# Altium PCB iMX6 Rex_V1I1_PCB.PcbDoc (part 1 of 8)
Units mm, origin at the board's own origin, x right, y up, seen from the top; angles counter-clockwise.
Board outline 70 x 40 mm, 12 copper layers (L1, L2, L3, L4, L5 (PWR), L6 (PWR), L7 (PWR), L8 (PWR), L9, L10, L11, L12), stack 1.566 mm thick; 473 components, 409 nets, 2294 pads, 1880 vias.
Unrouted connection lines stored in the file: 7.
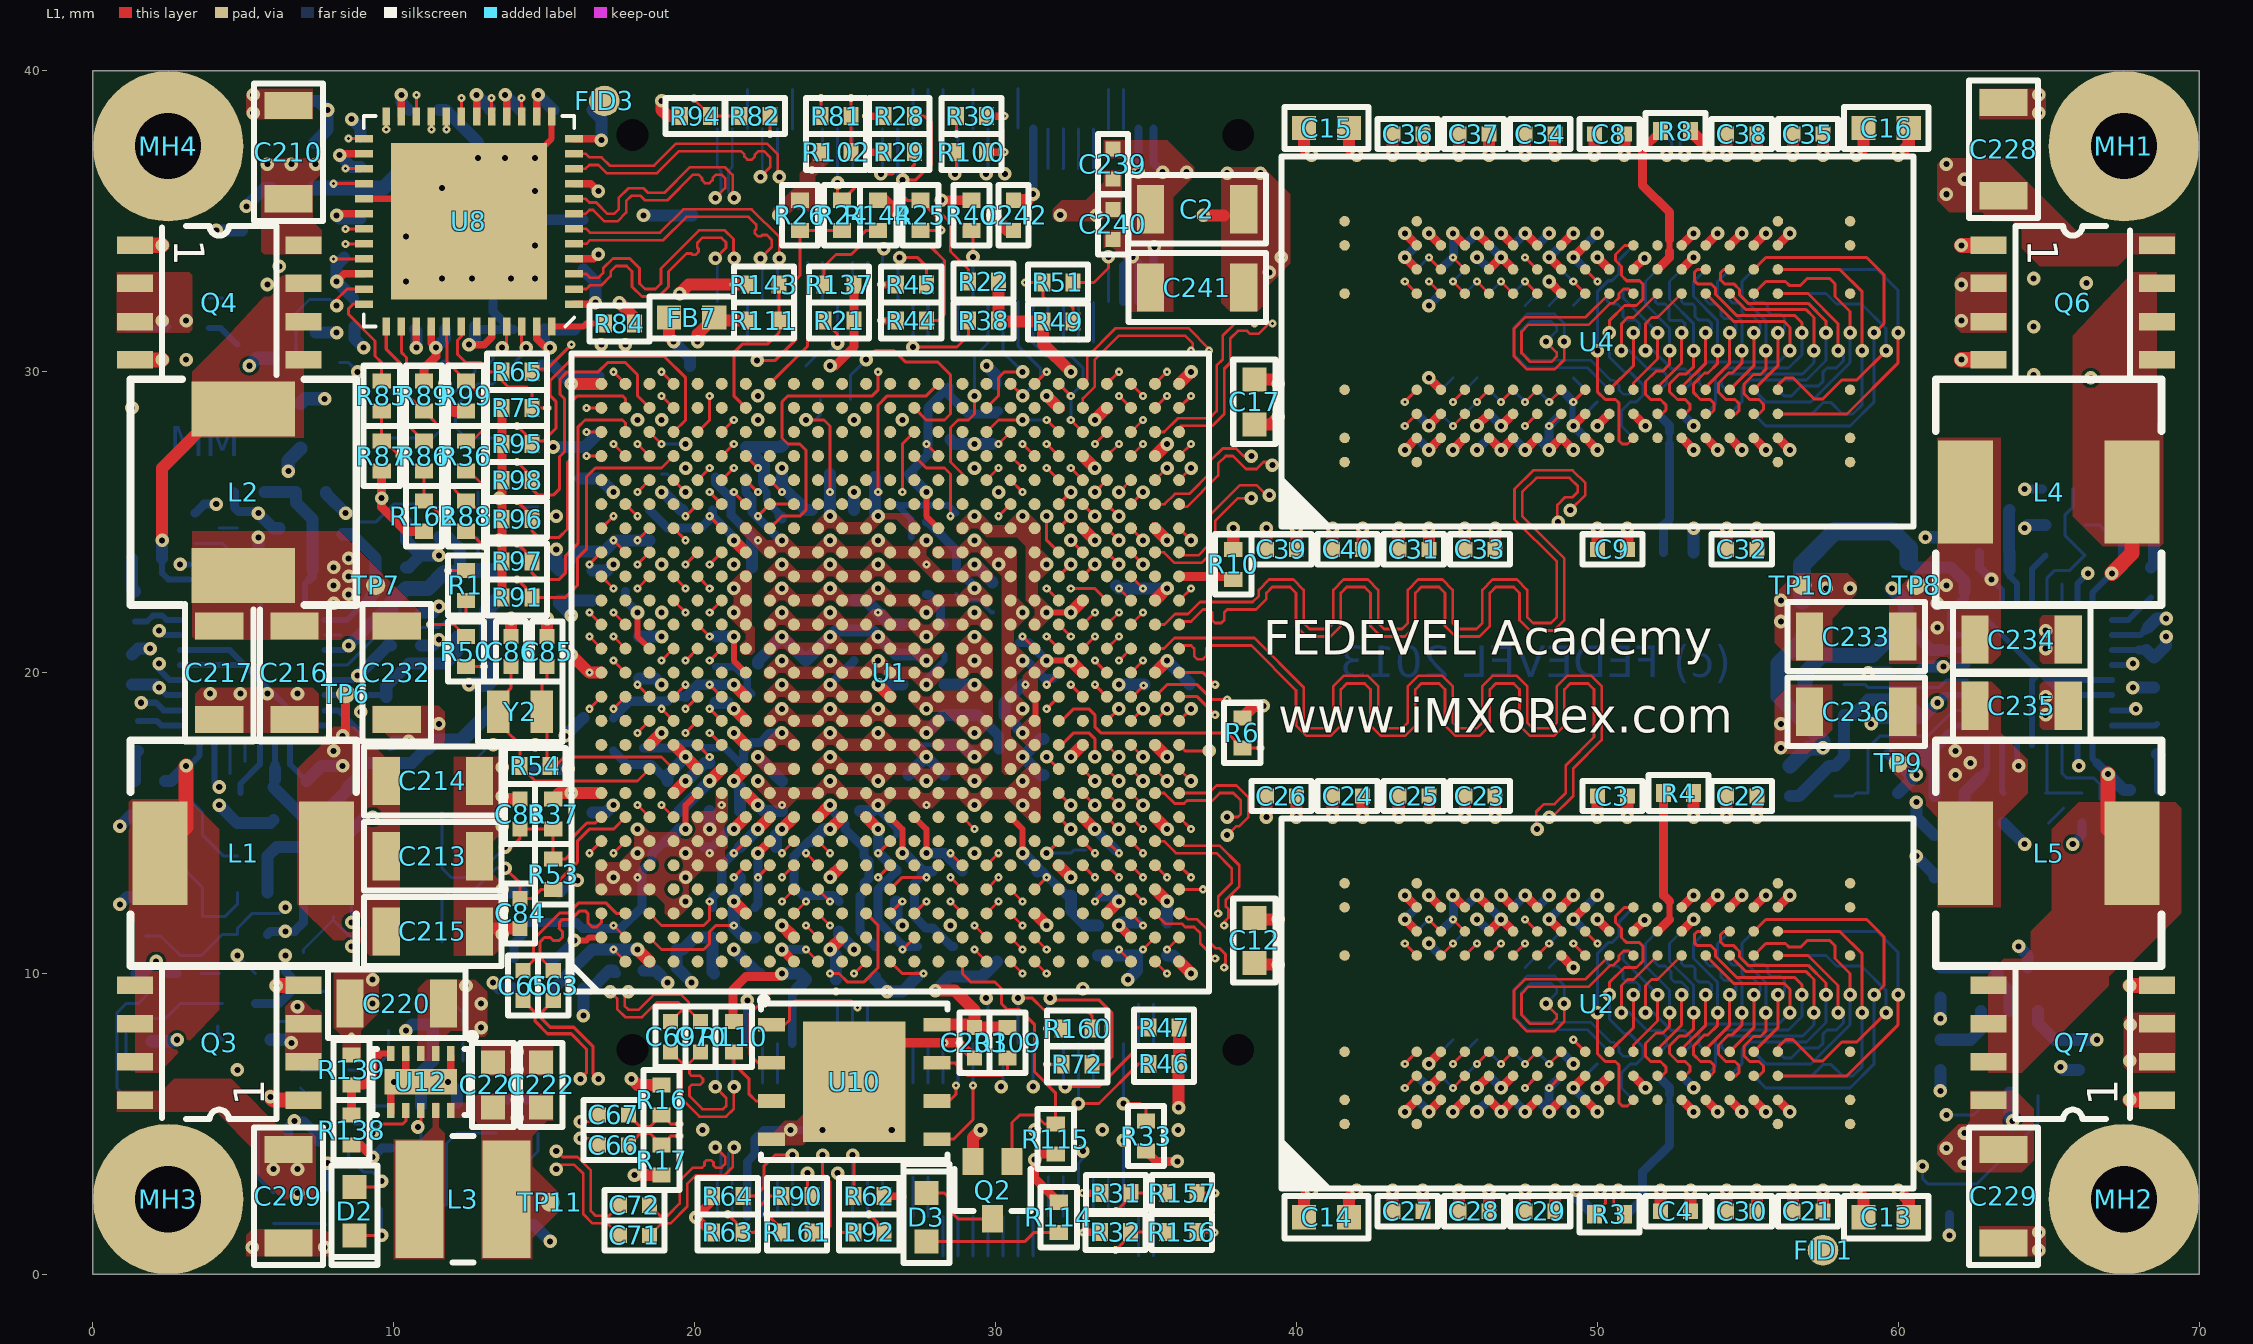
[diagram p0: L1 view]
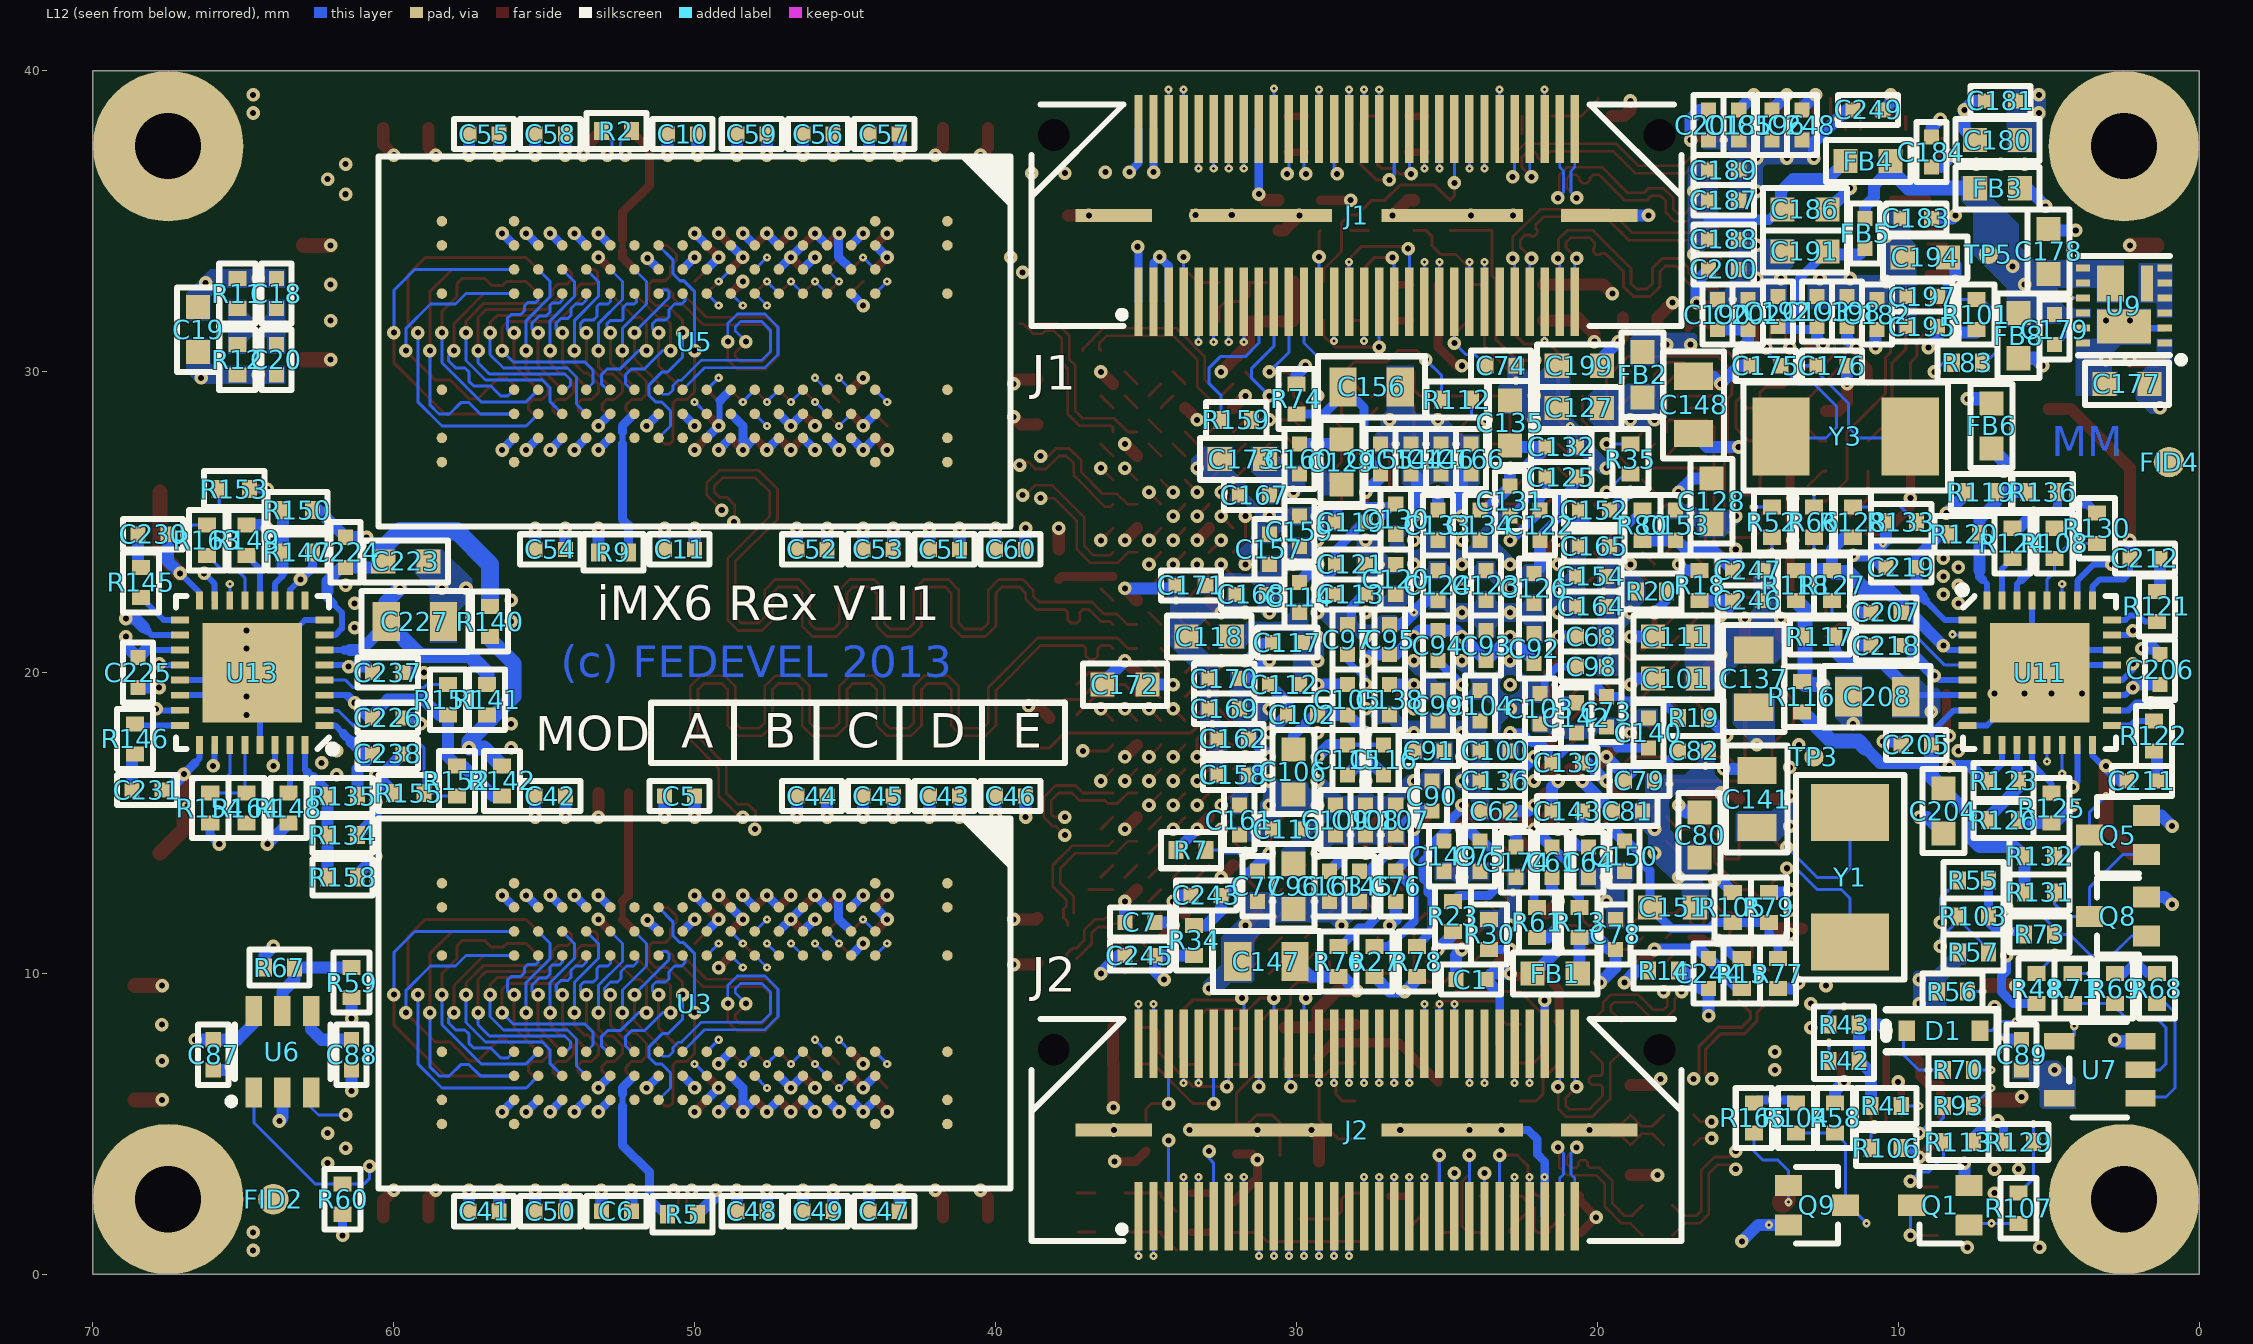
[diagram p1: L12 view, seen from below]
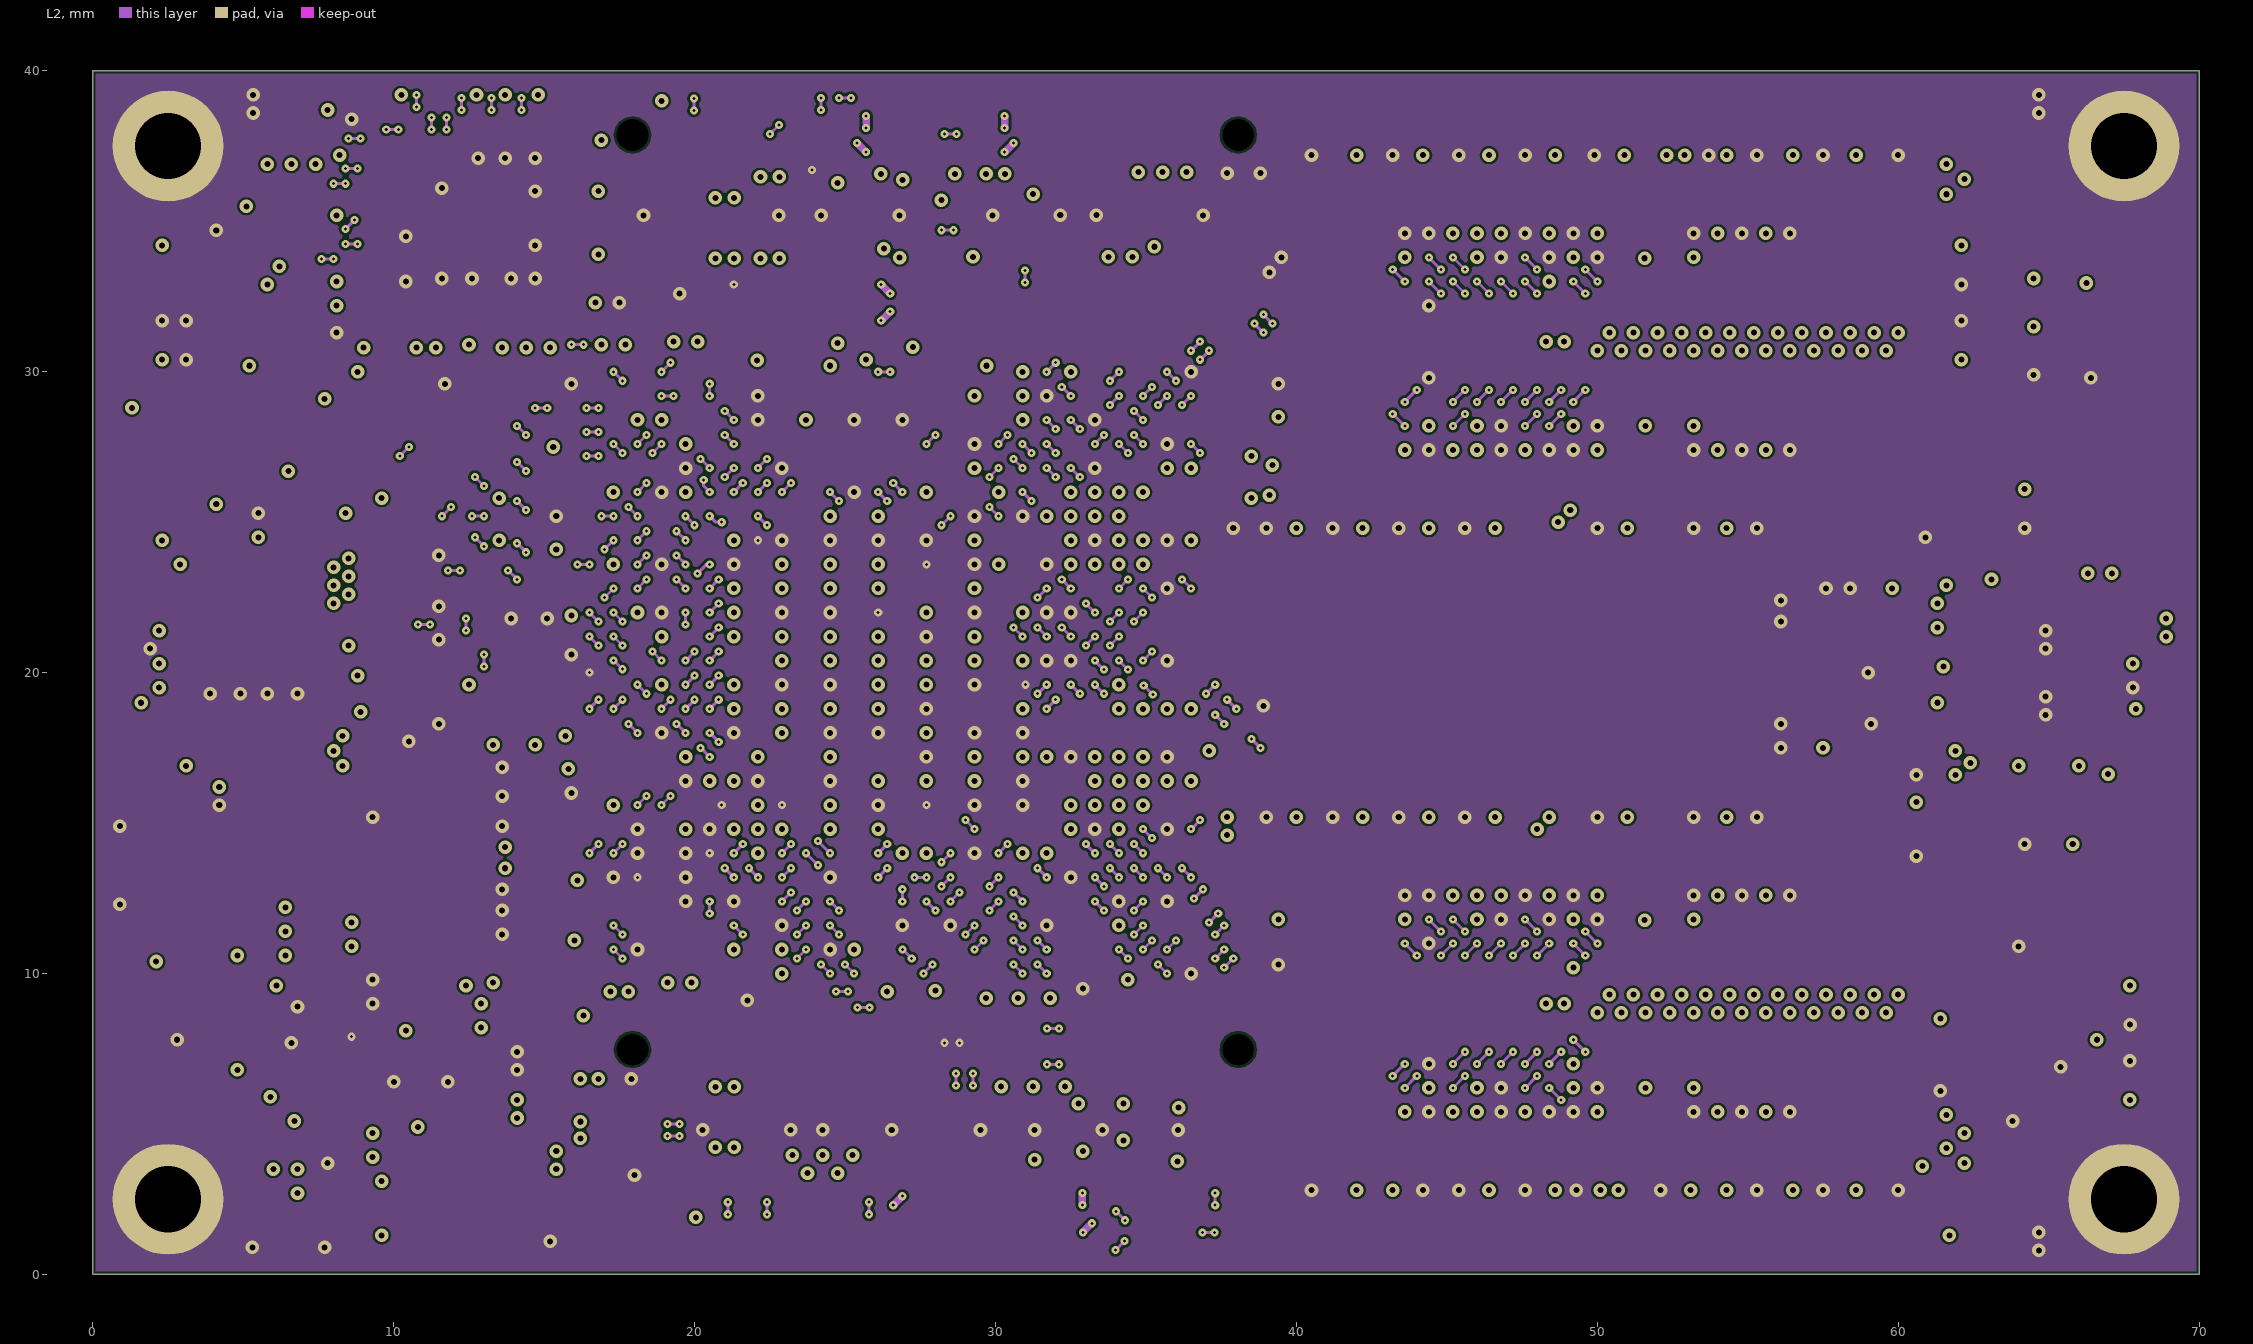
[diagram p2: L2]
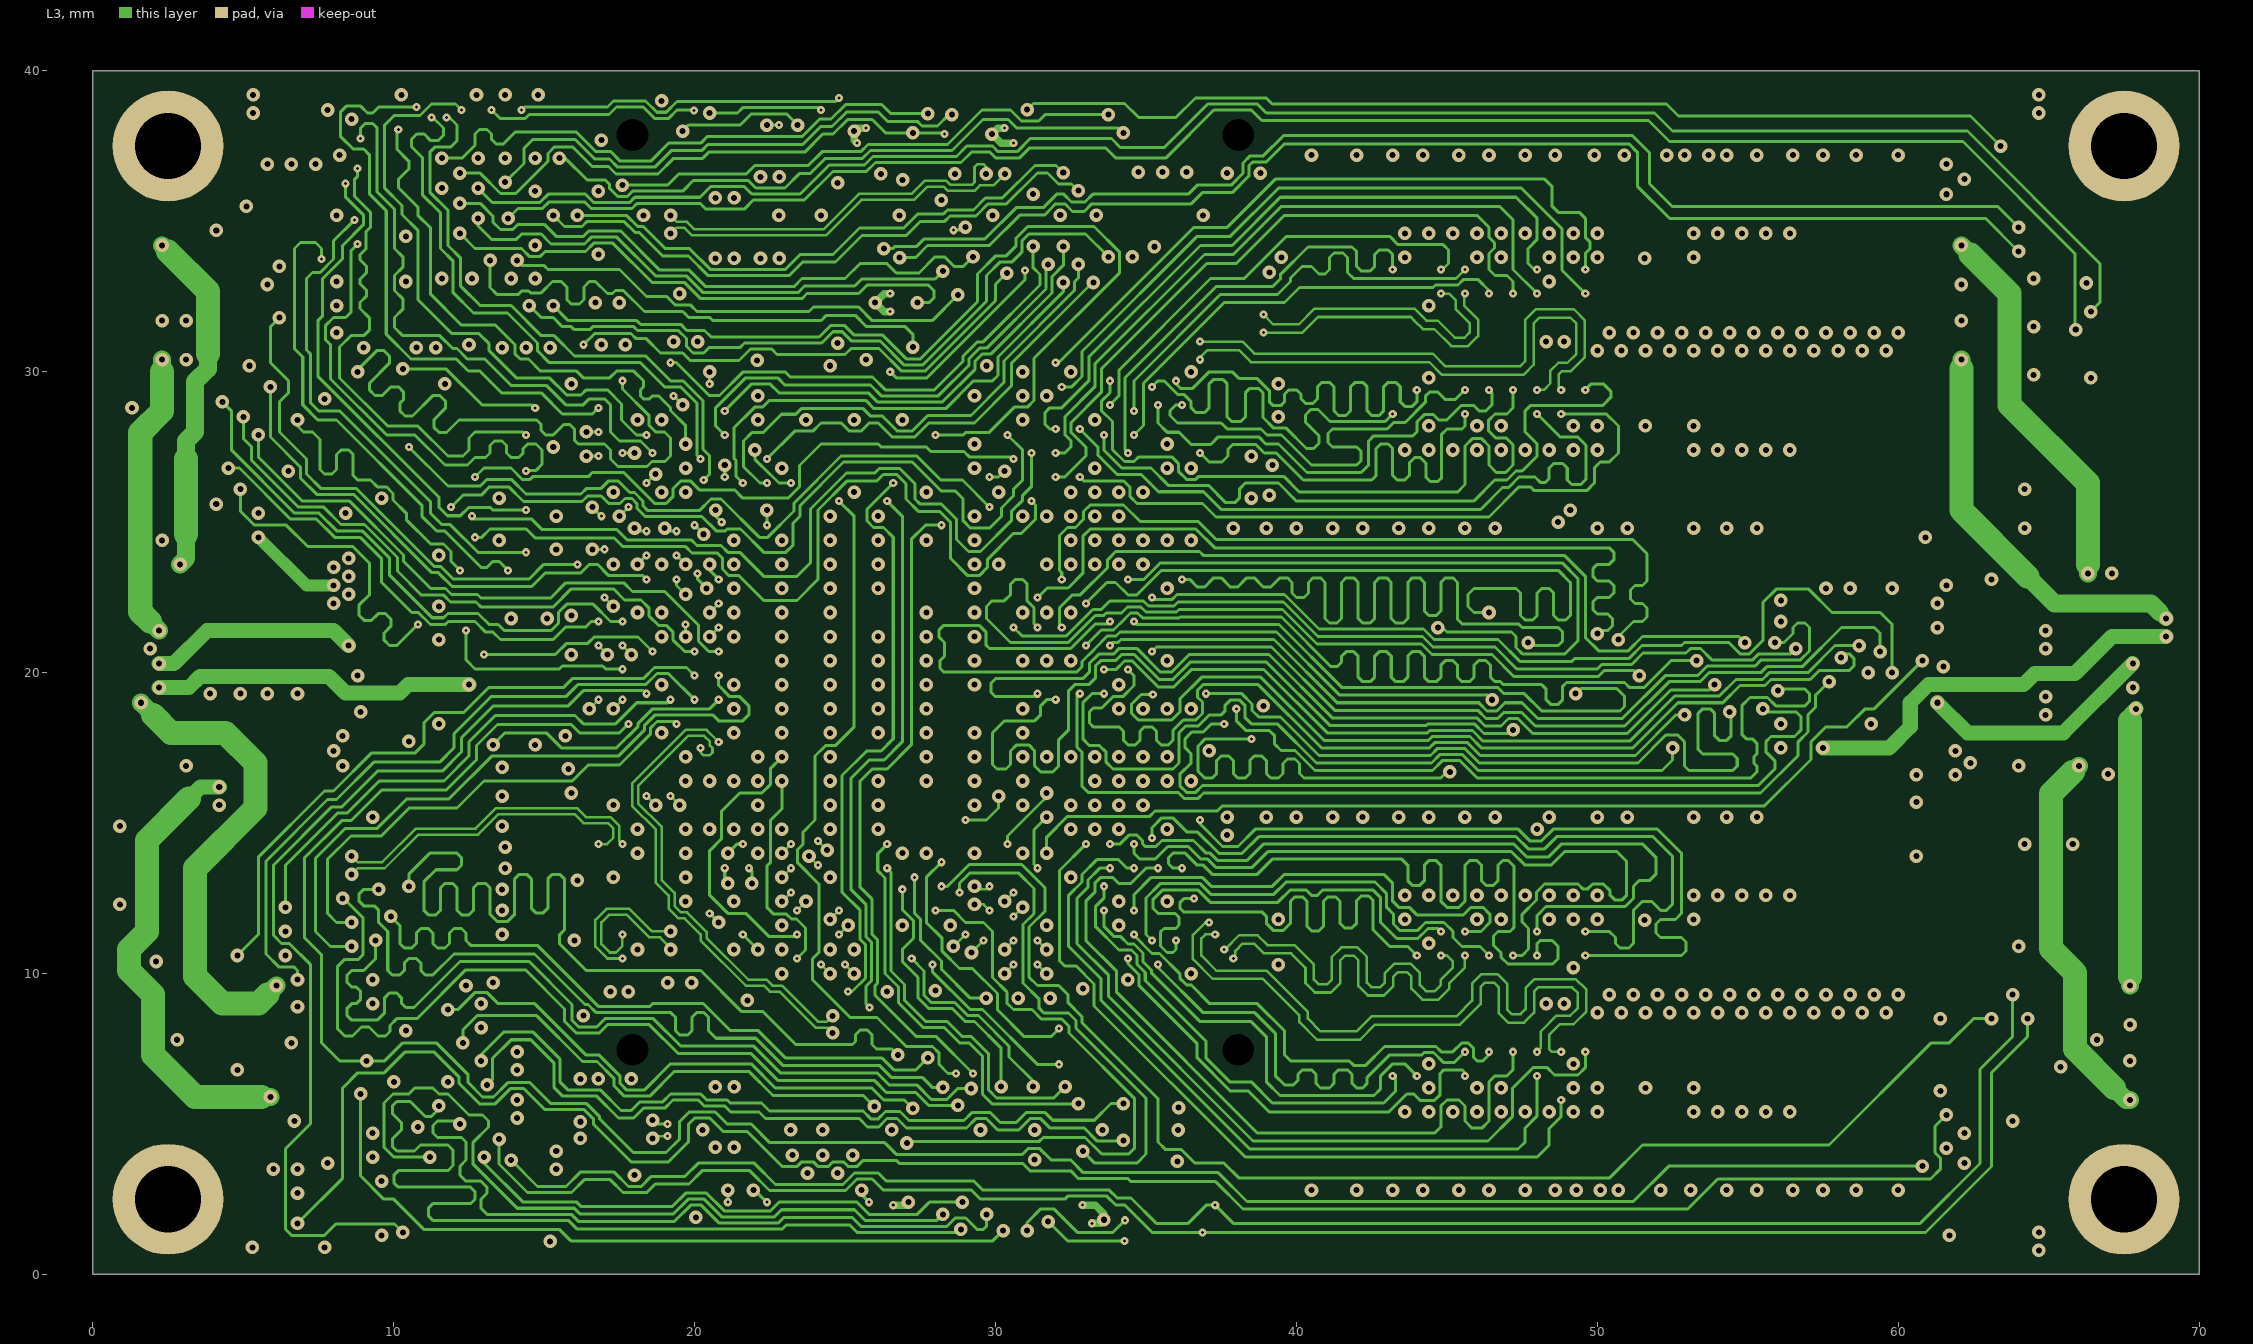
[diagram p3: L3]
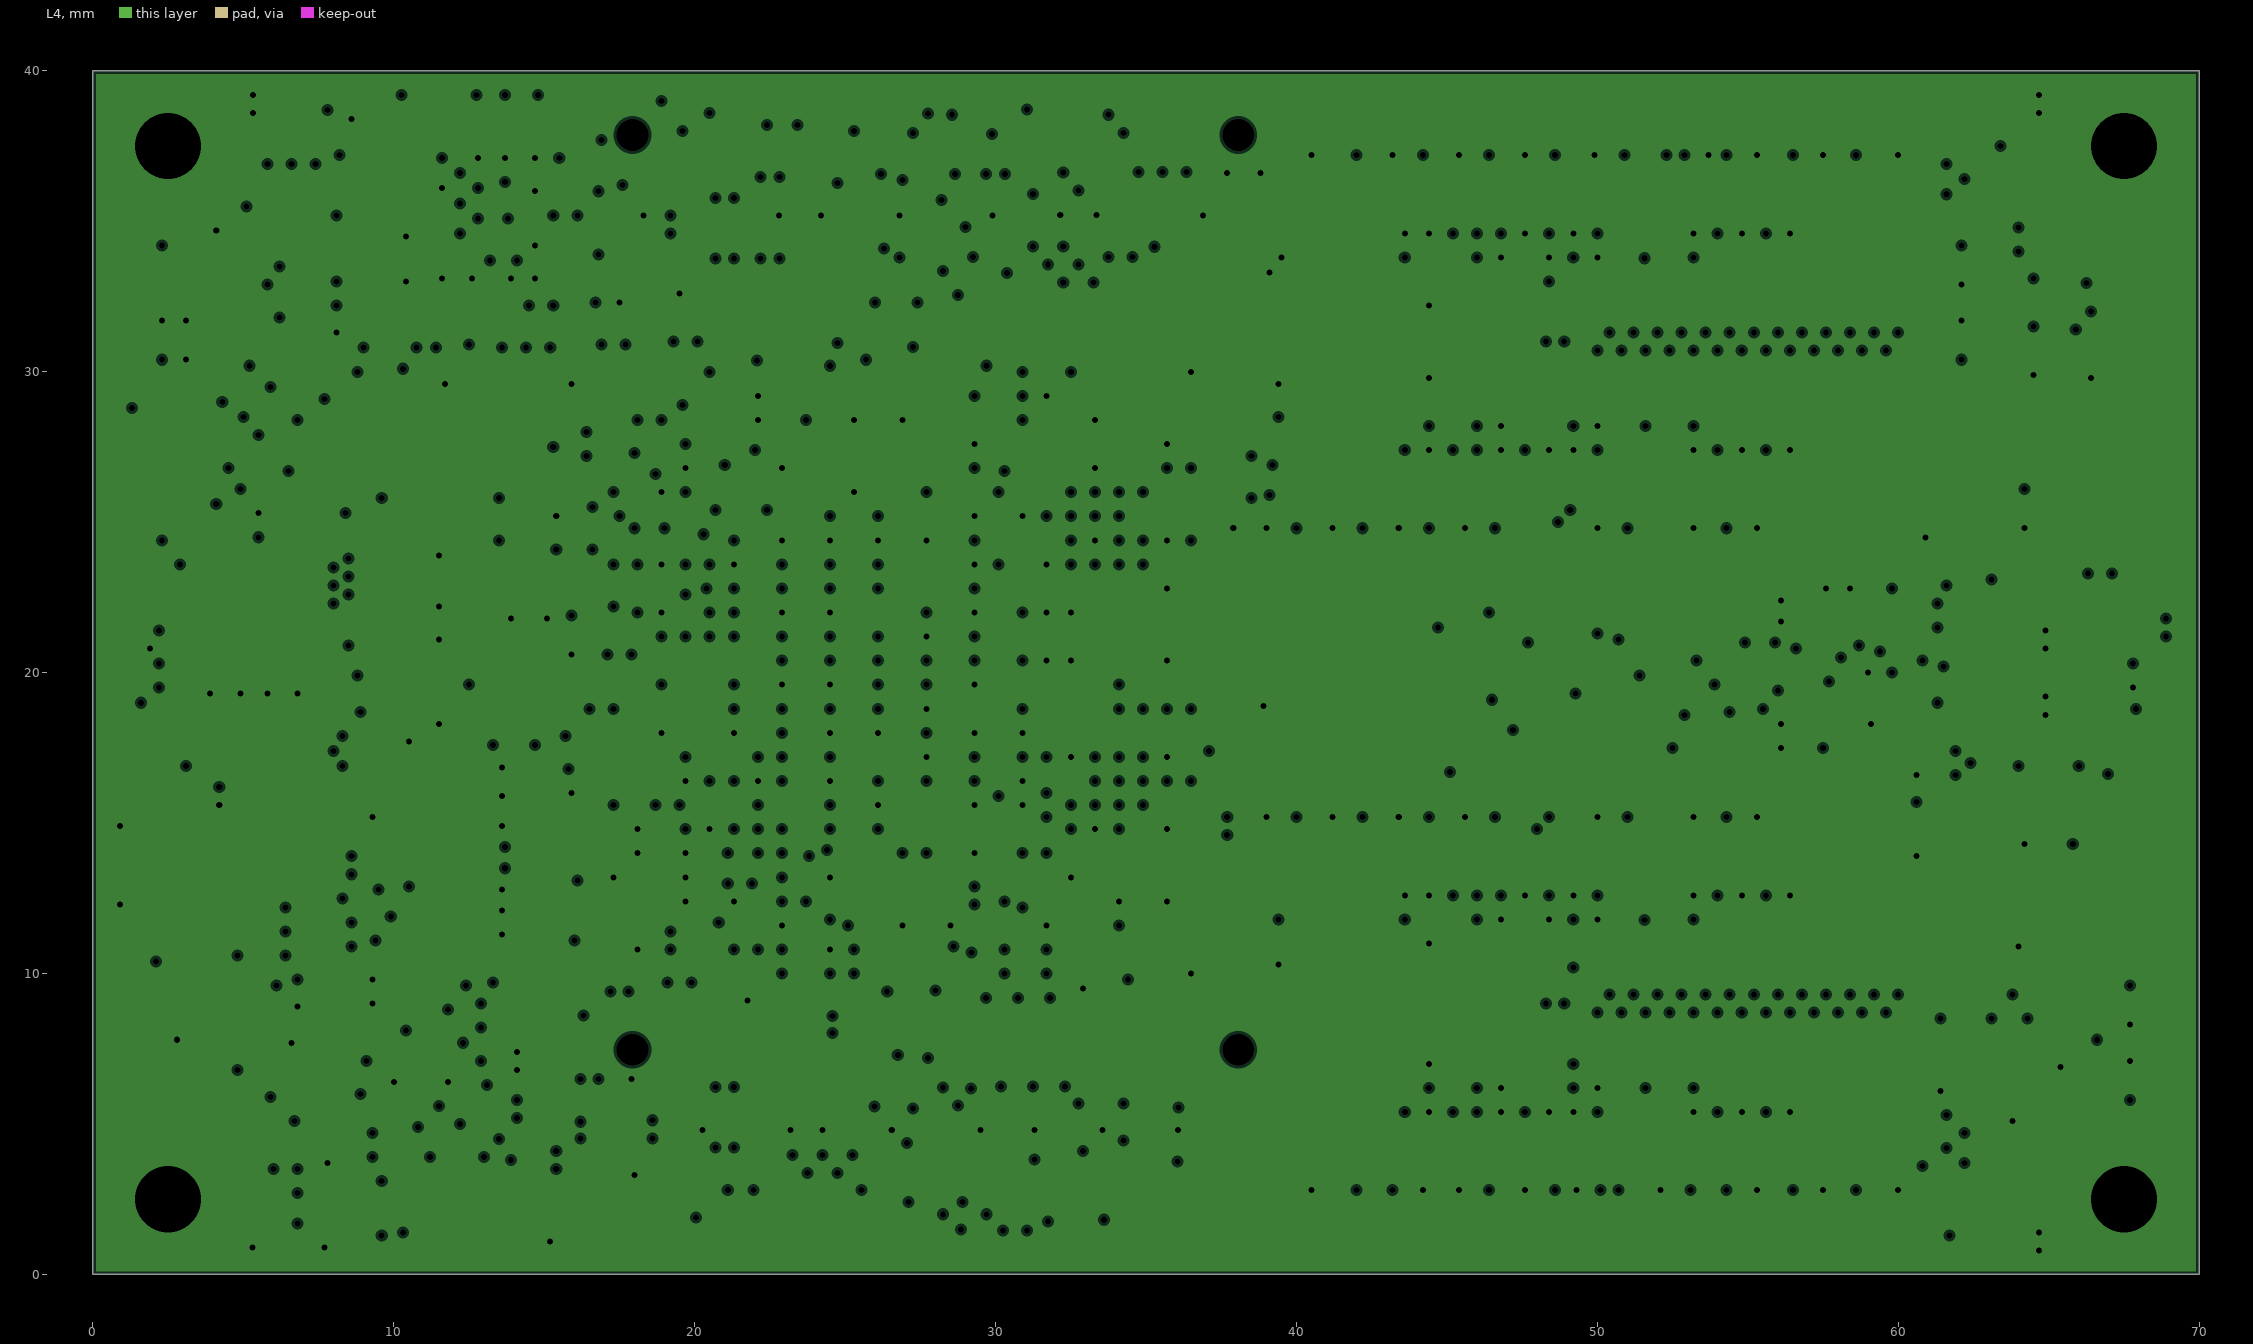
[diagram p4: L4, clearances drawn from the general rule]
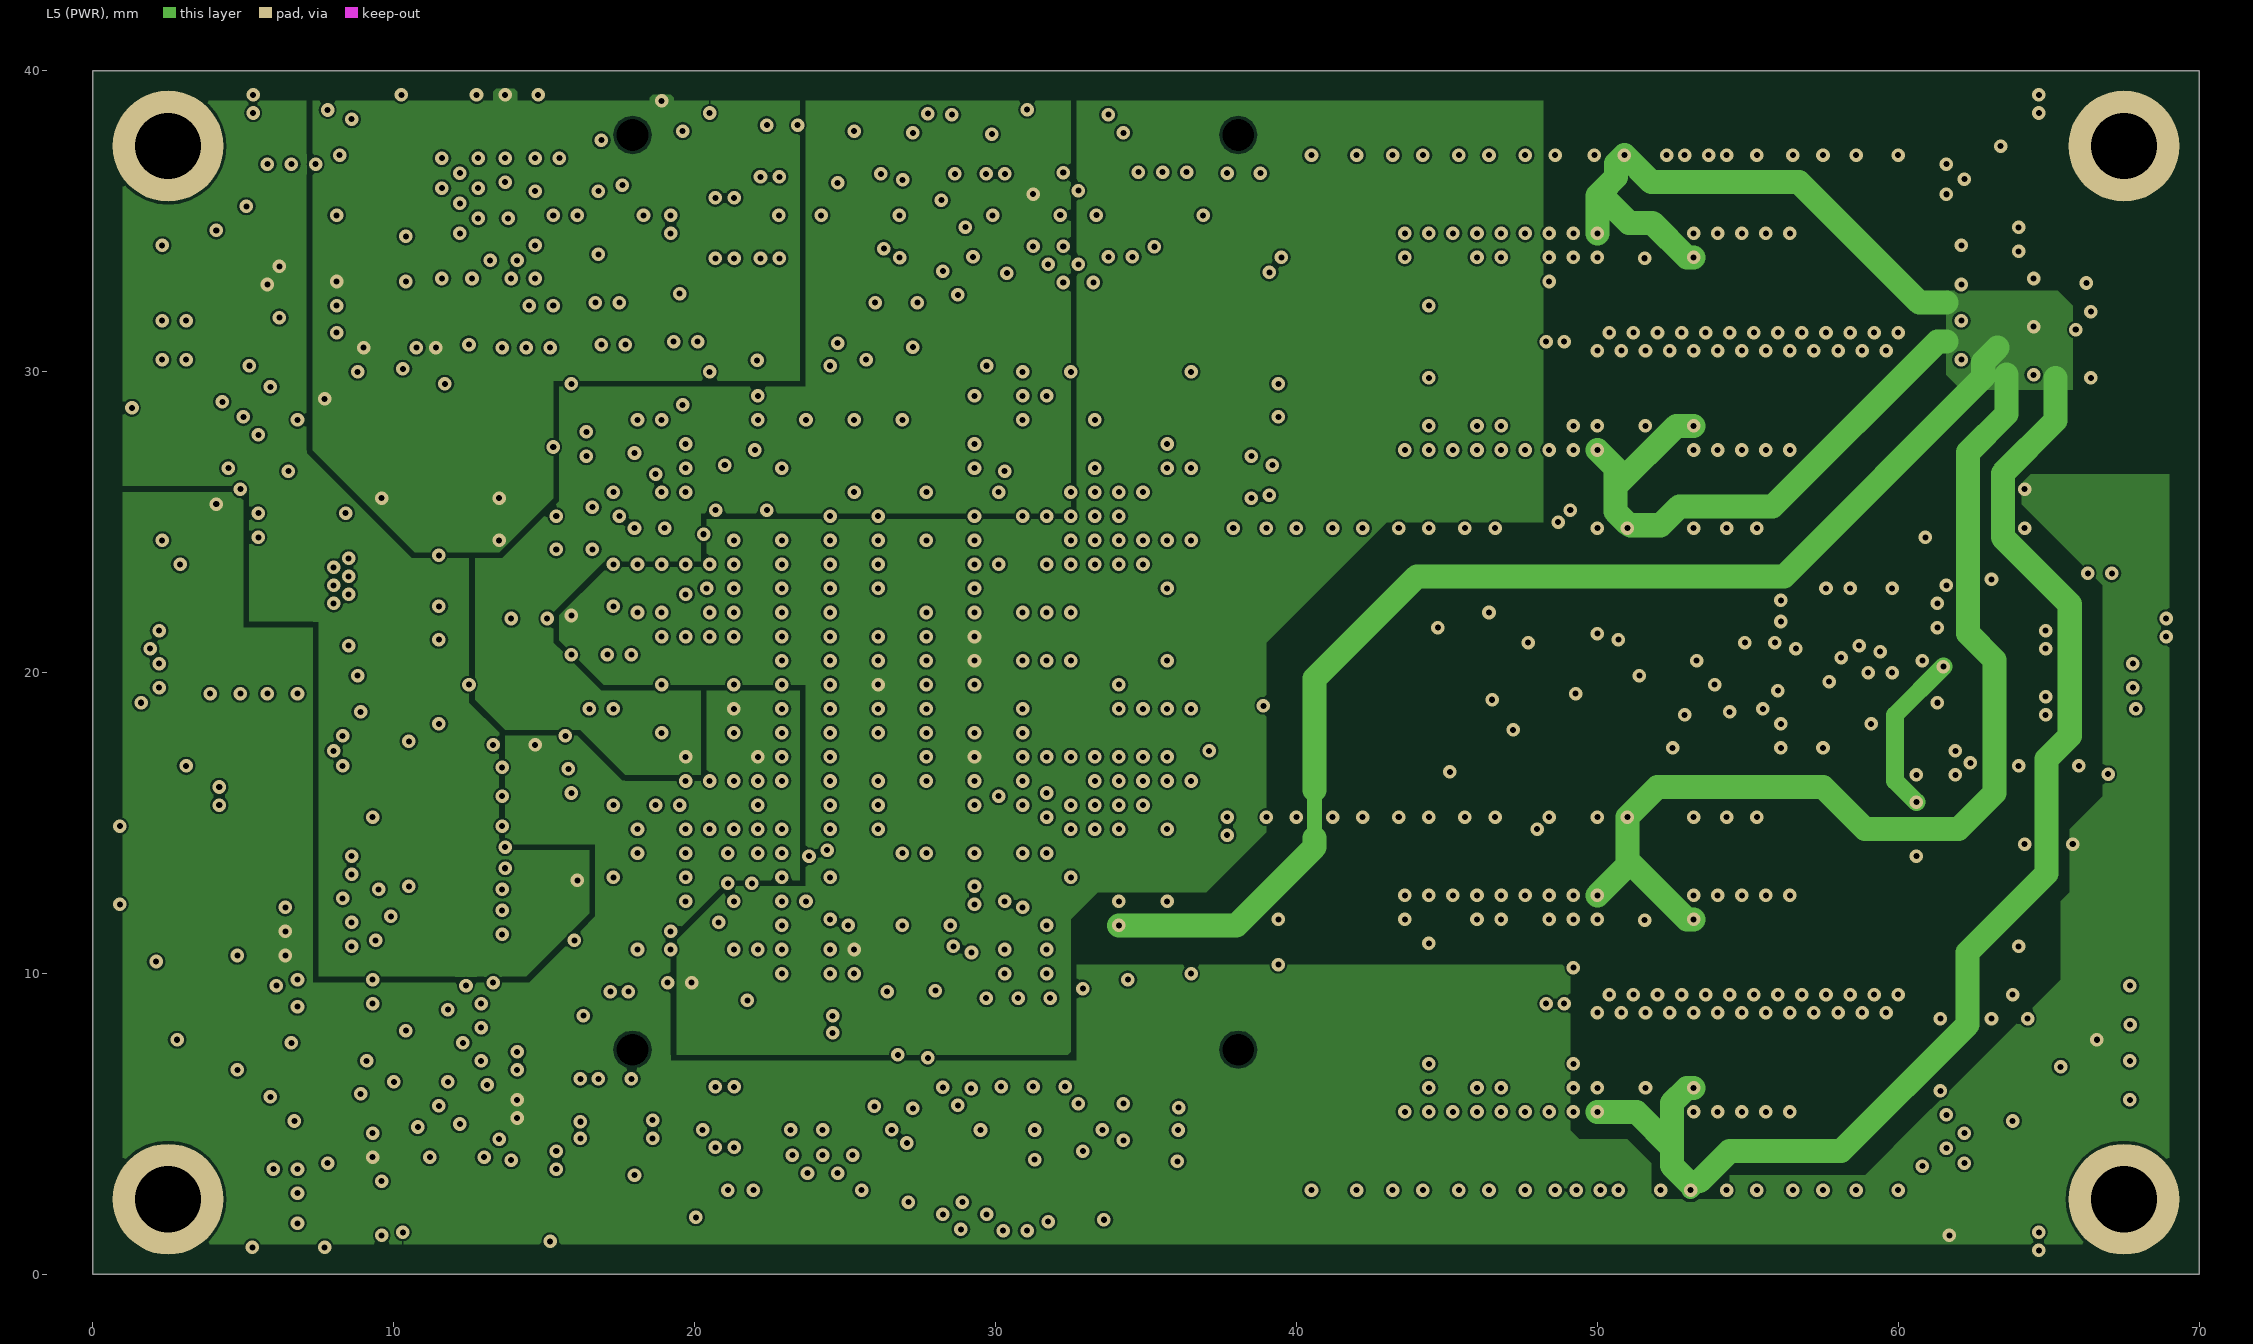
[diagram p5: L5 (PWR)]
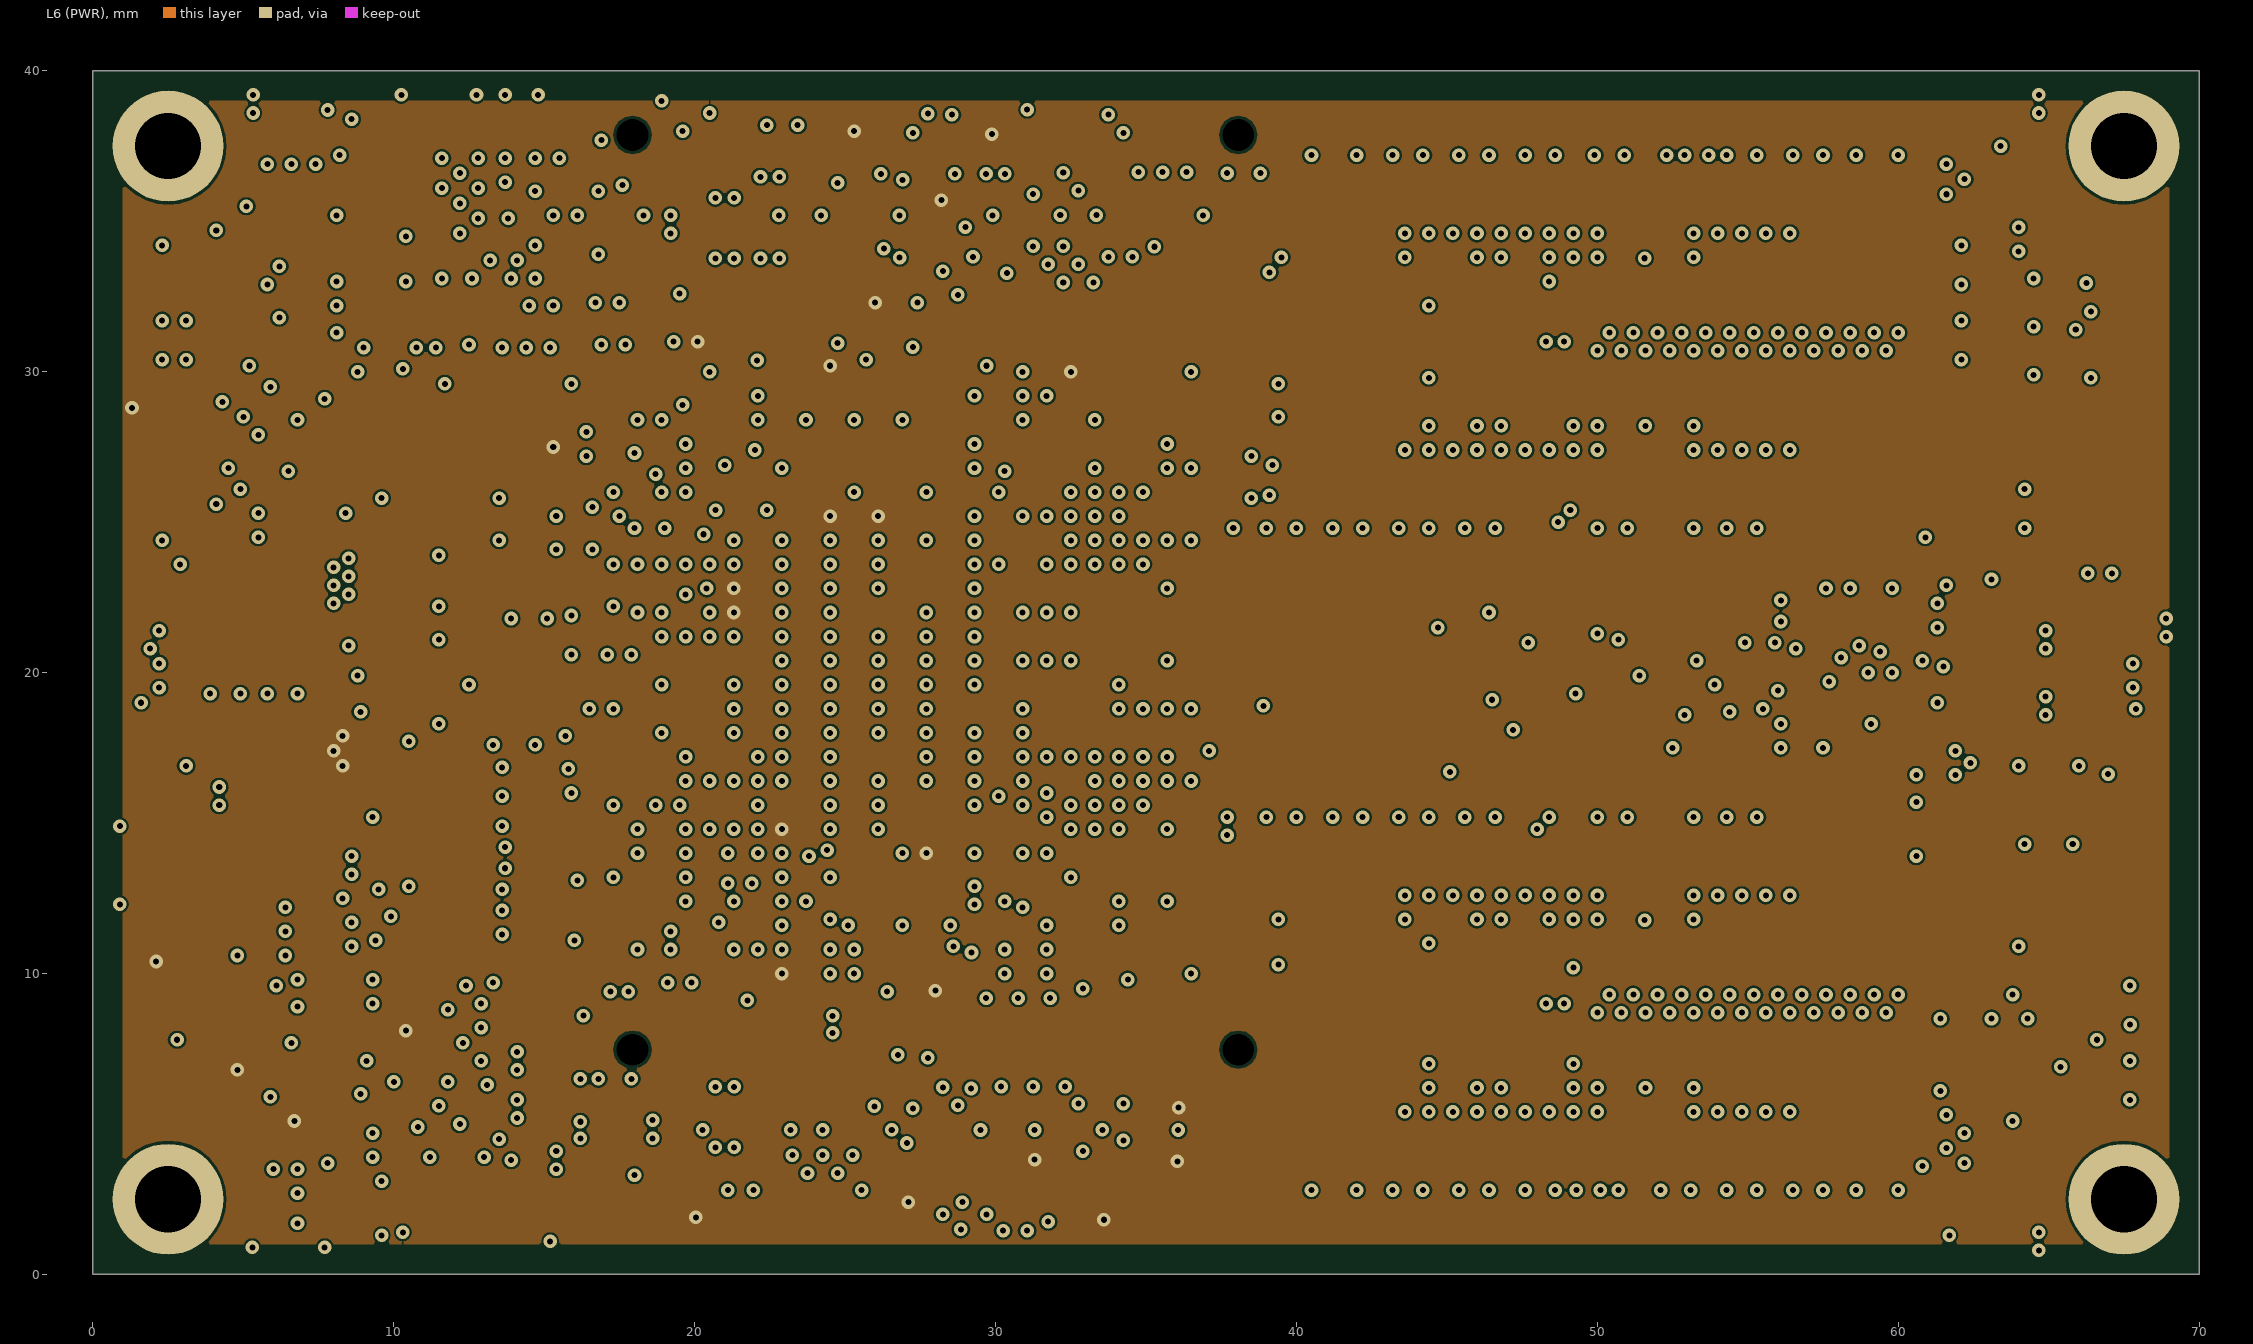
[diagram p6: L6 (PWR)]
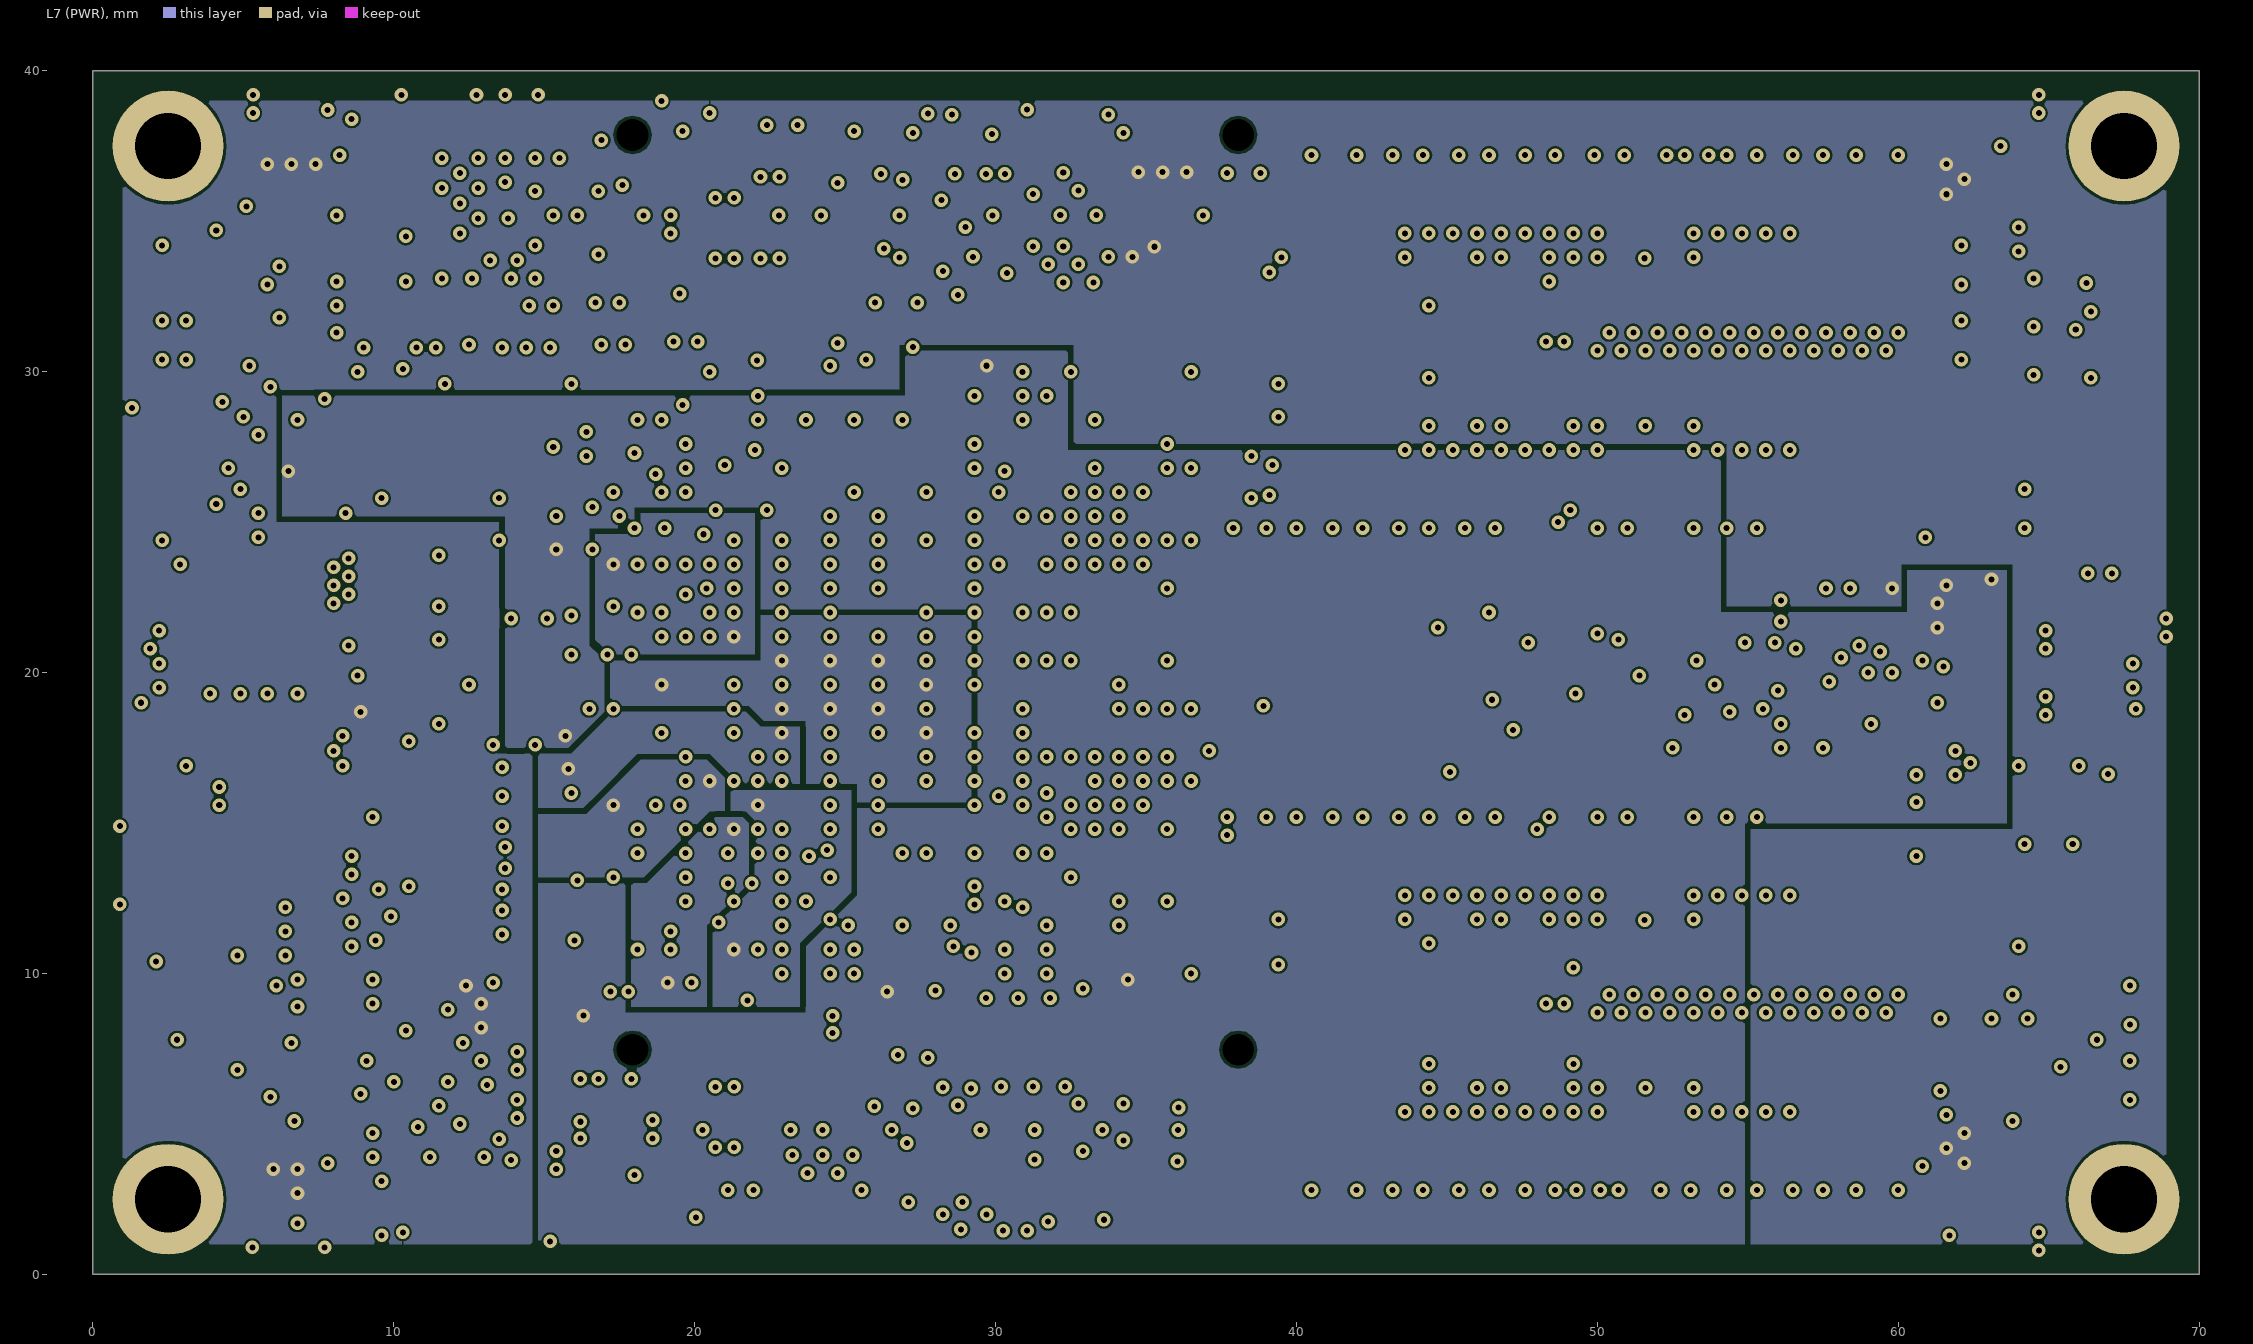
[diagram p7: L7 (PWR)]
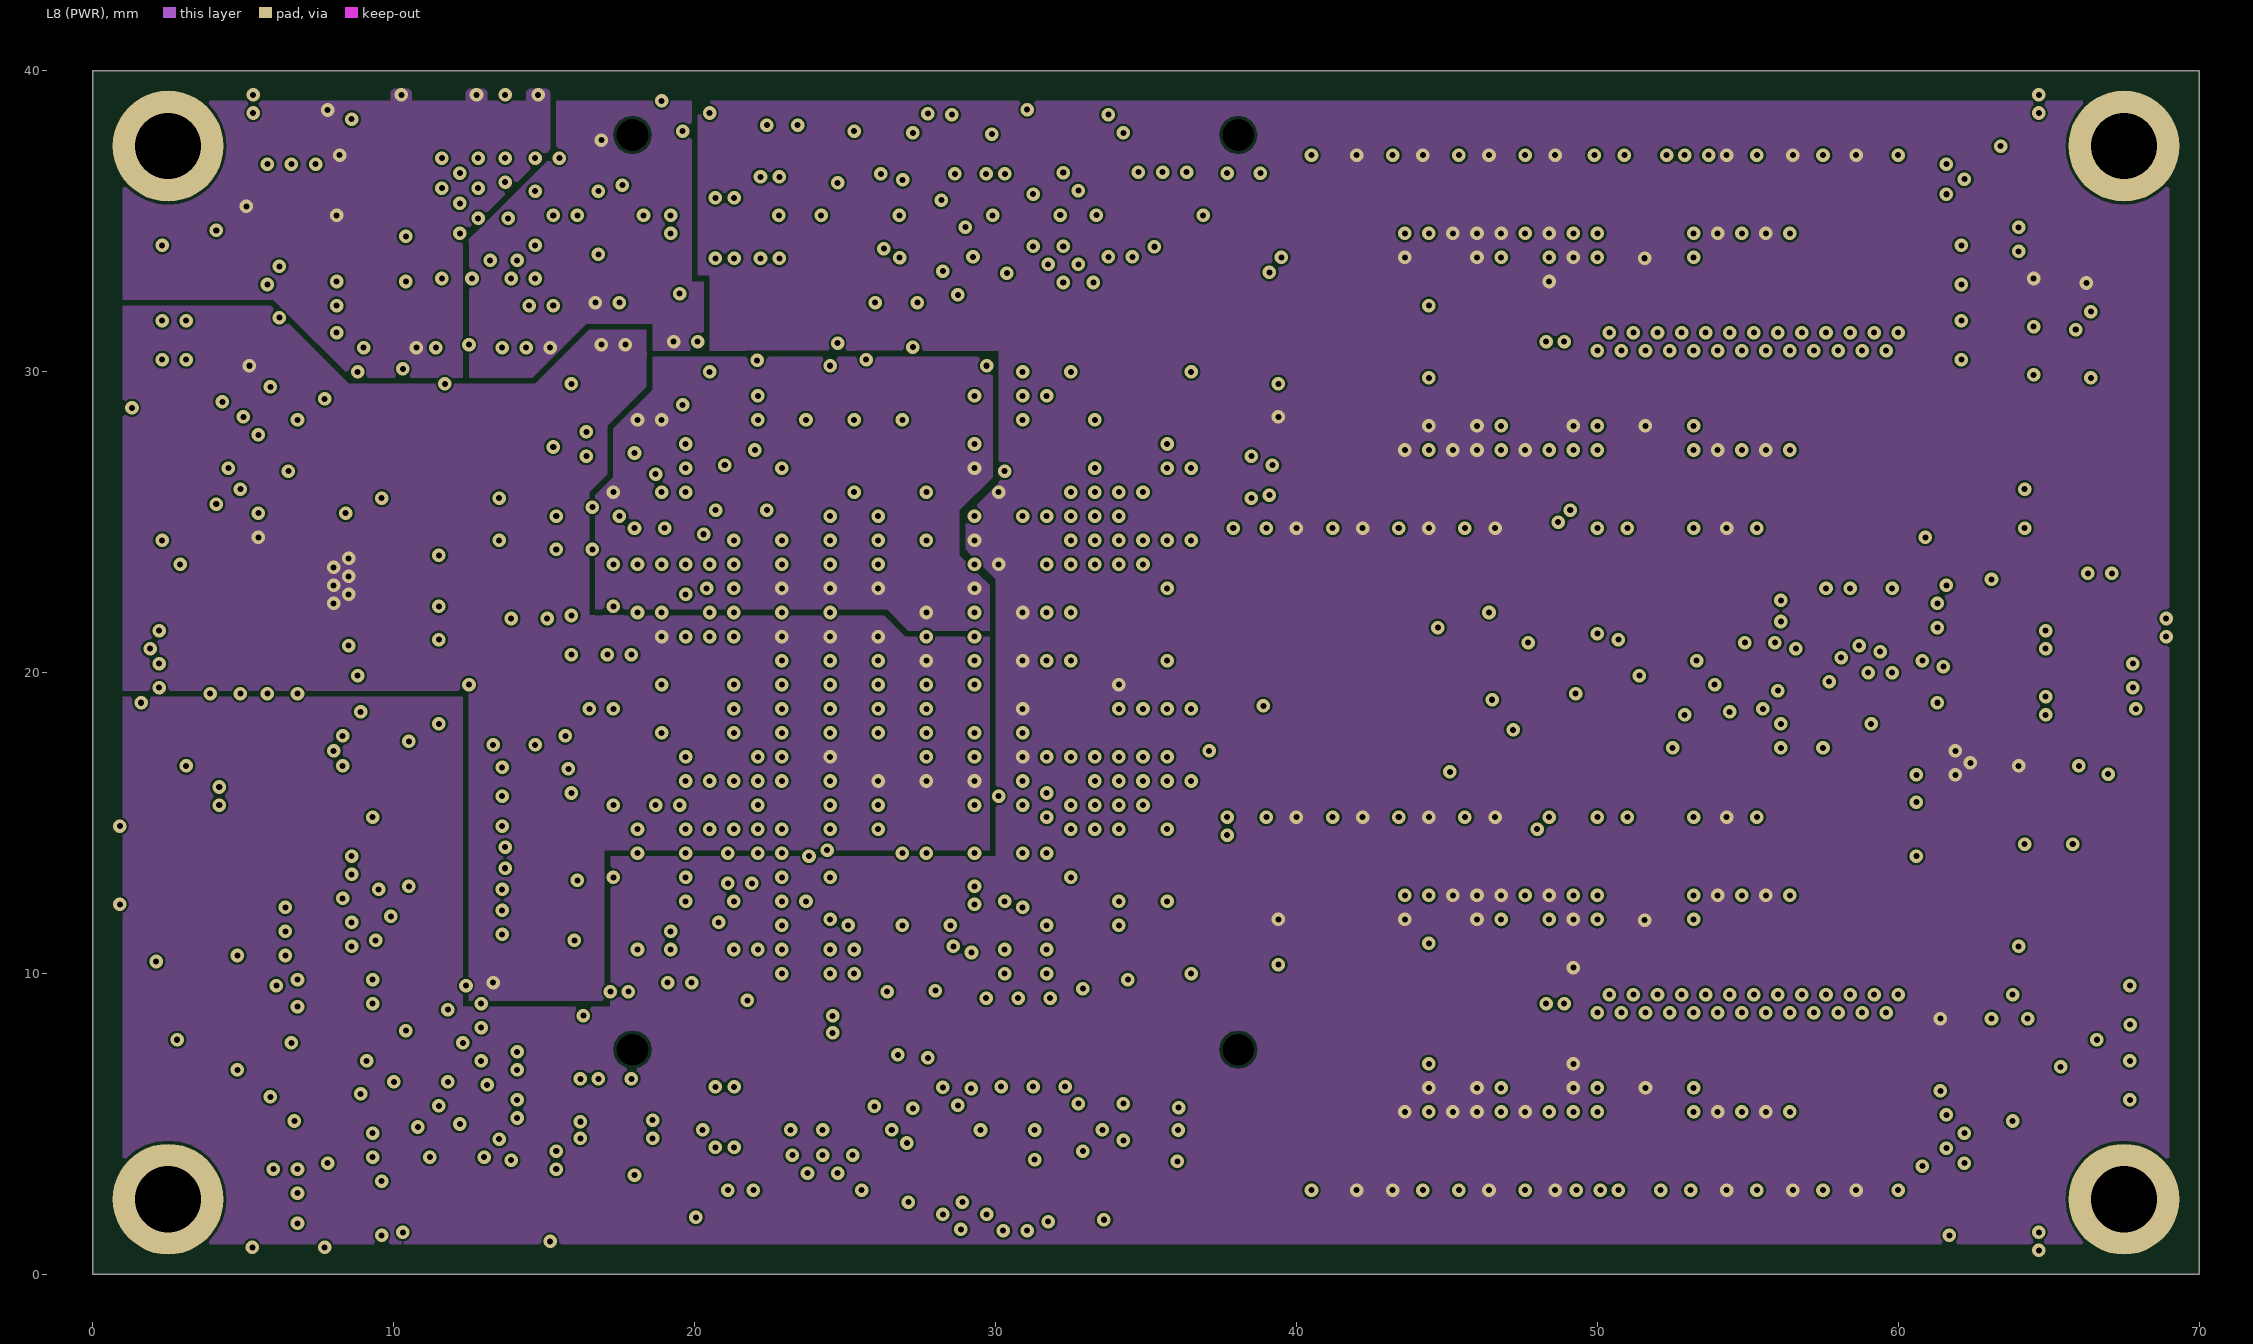
[diagram p8: L8 (PWR)]
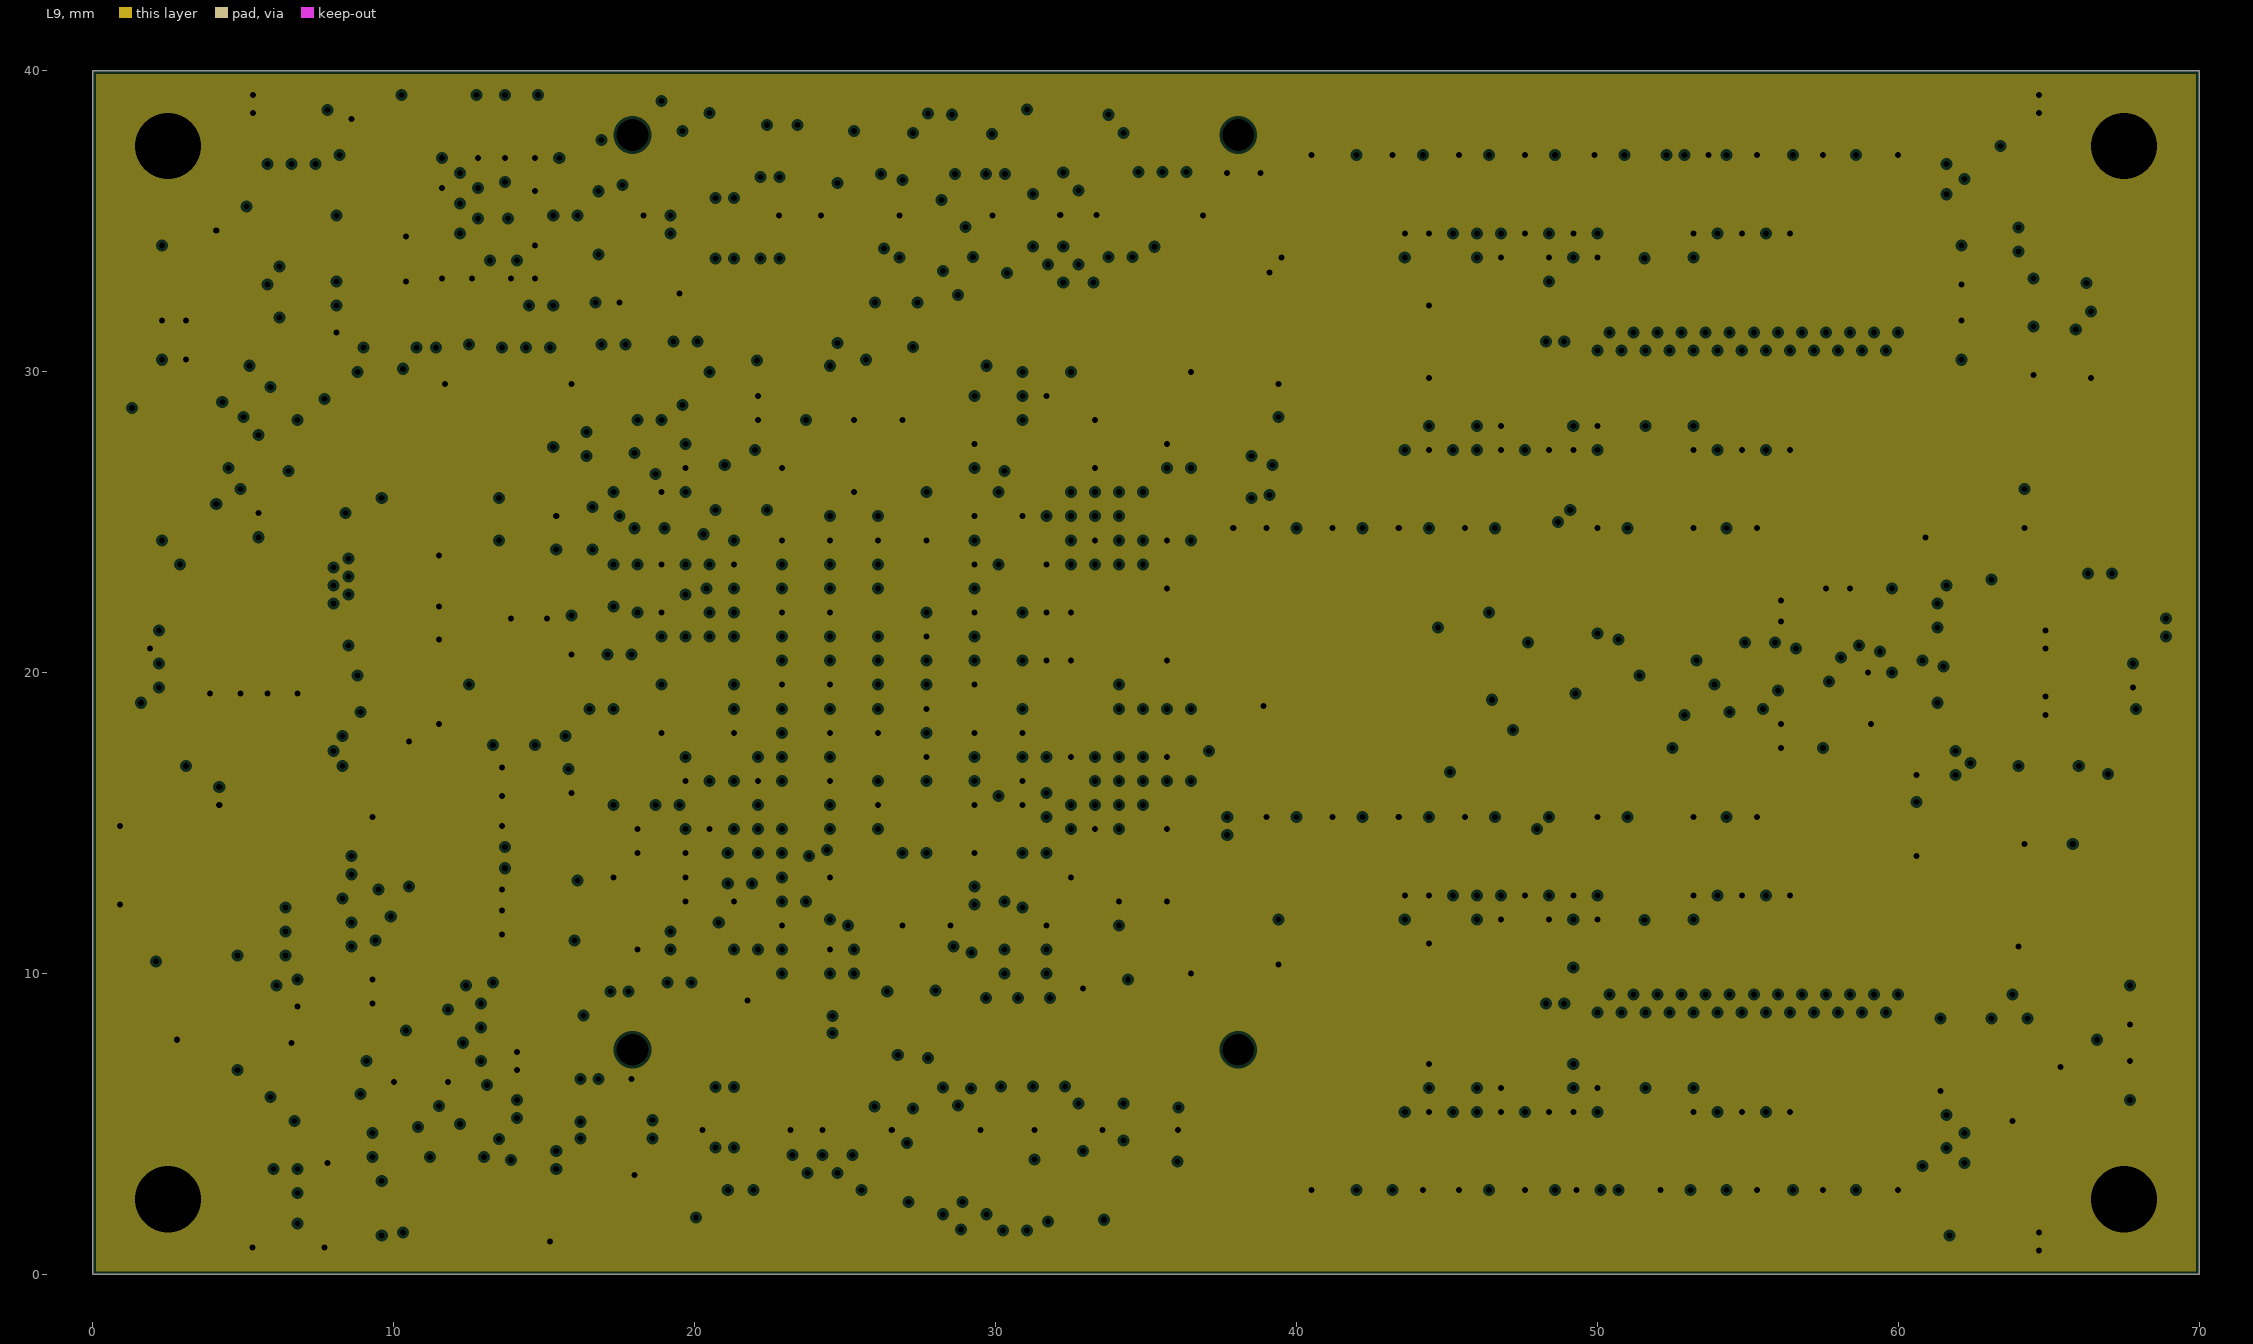
[diagram p9: L9, clearances drawn from the general rule]
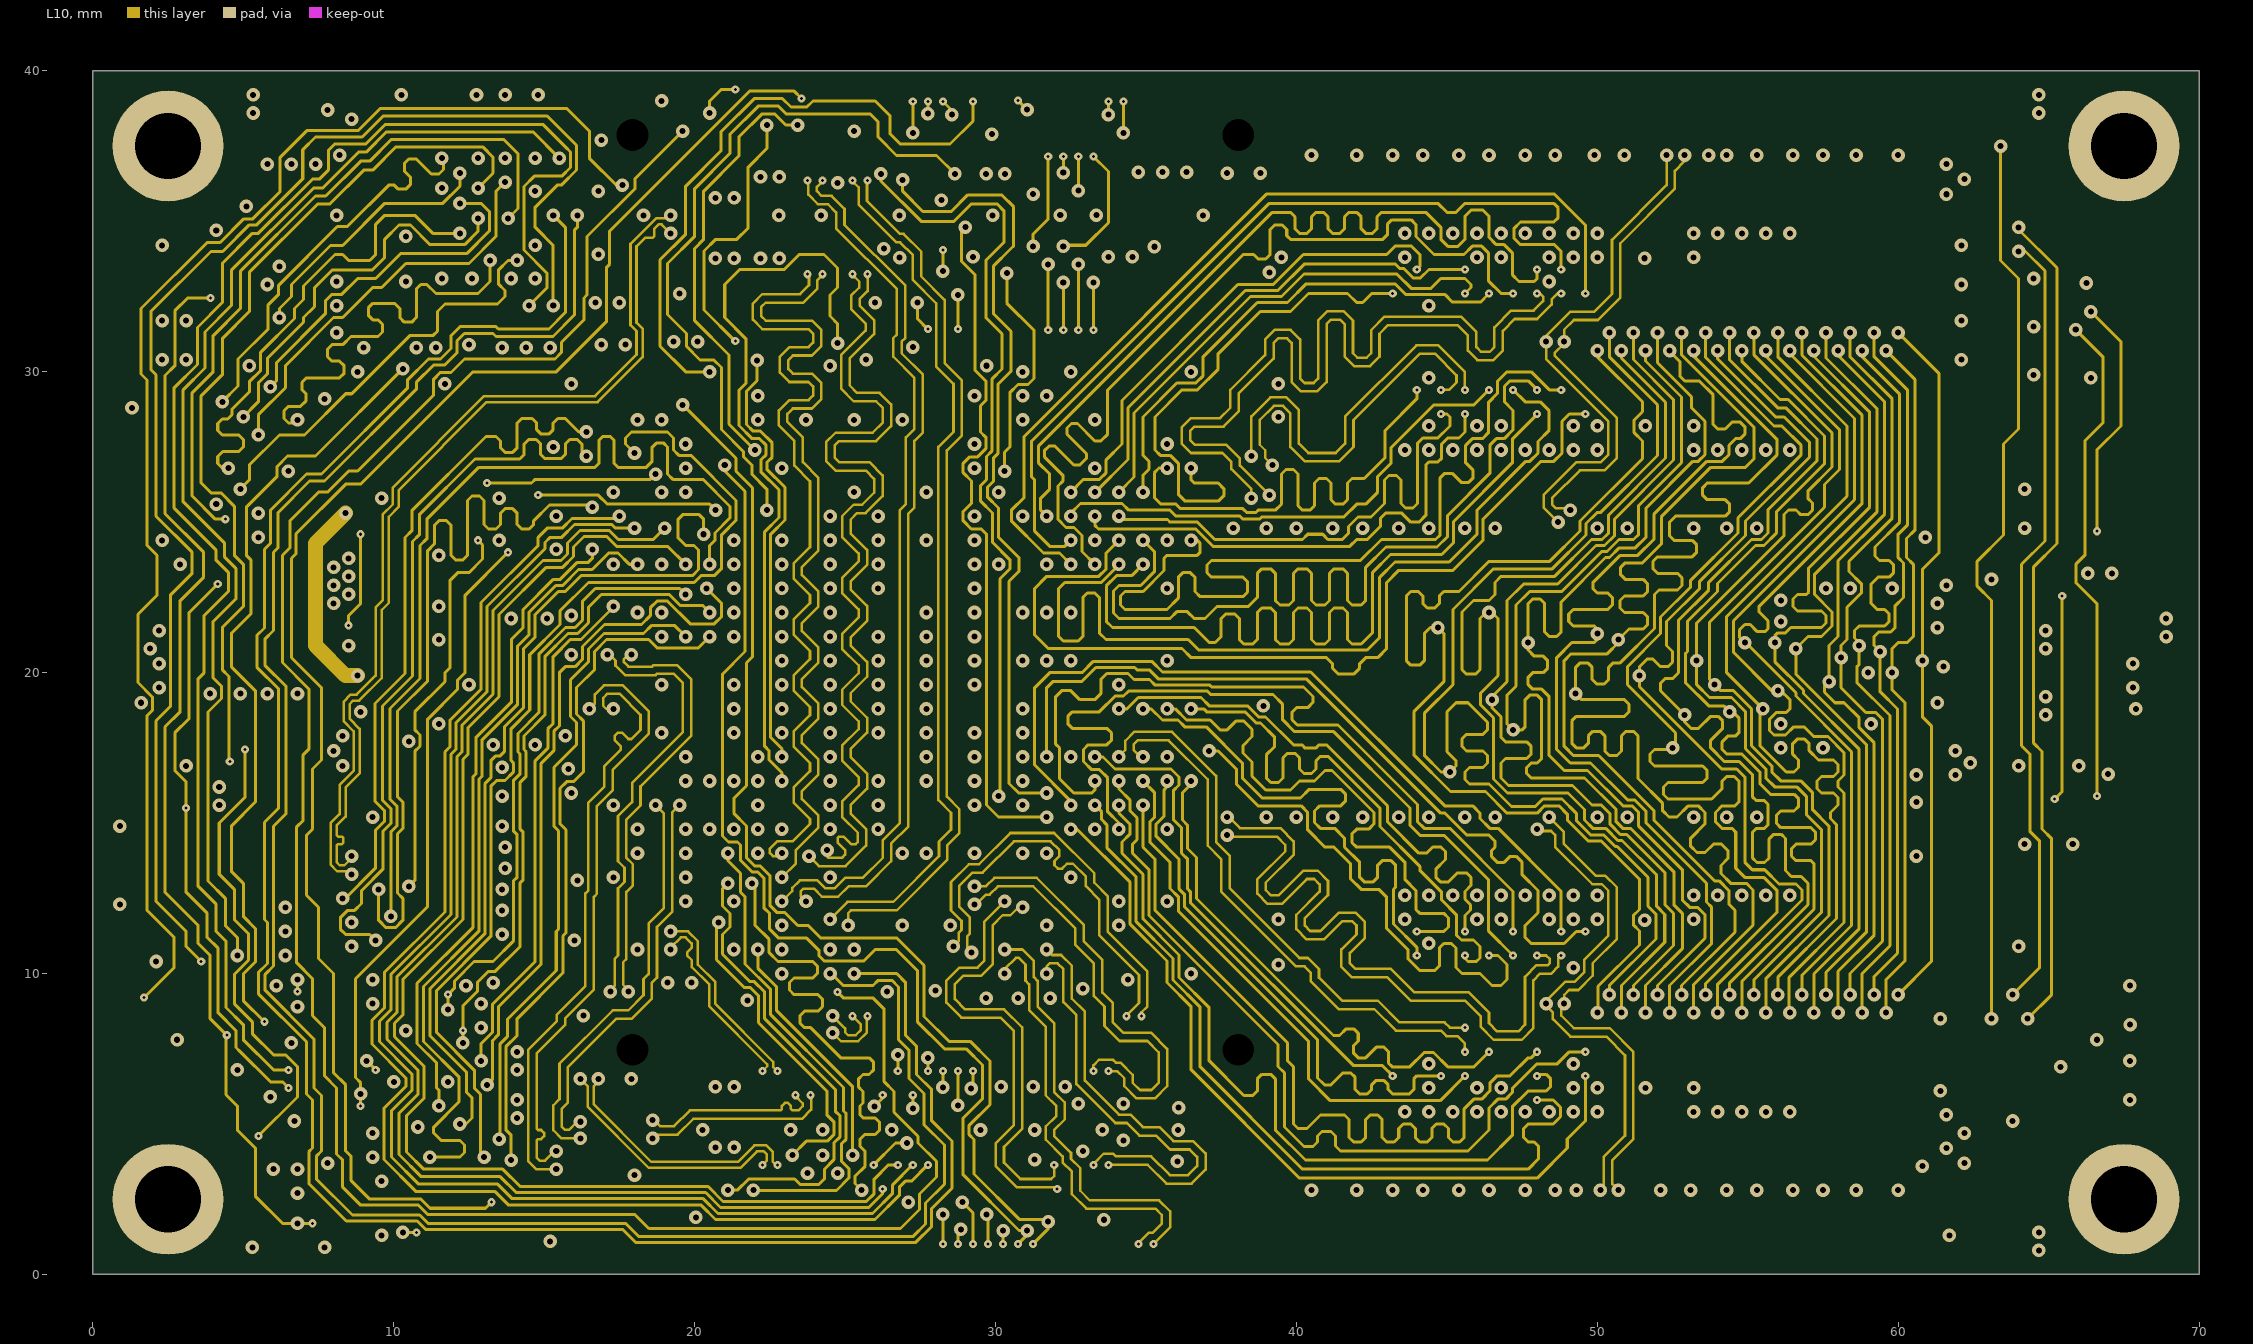
[diagram p10: L10]
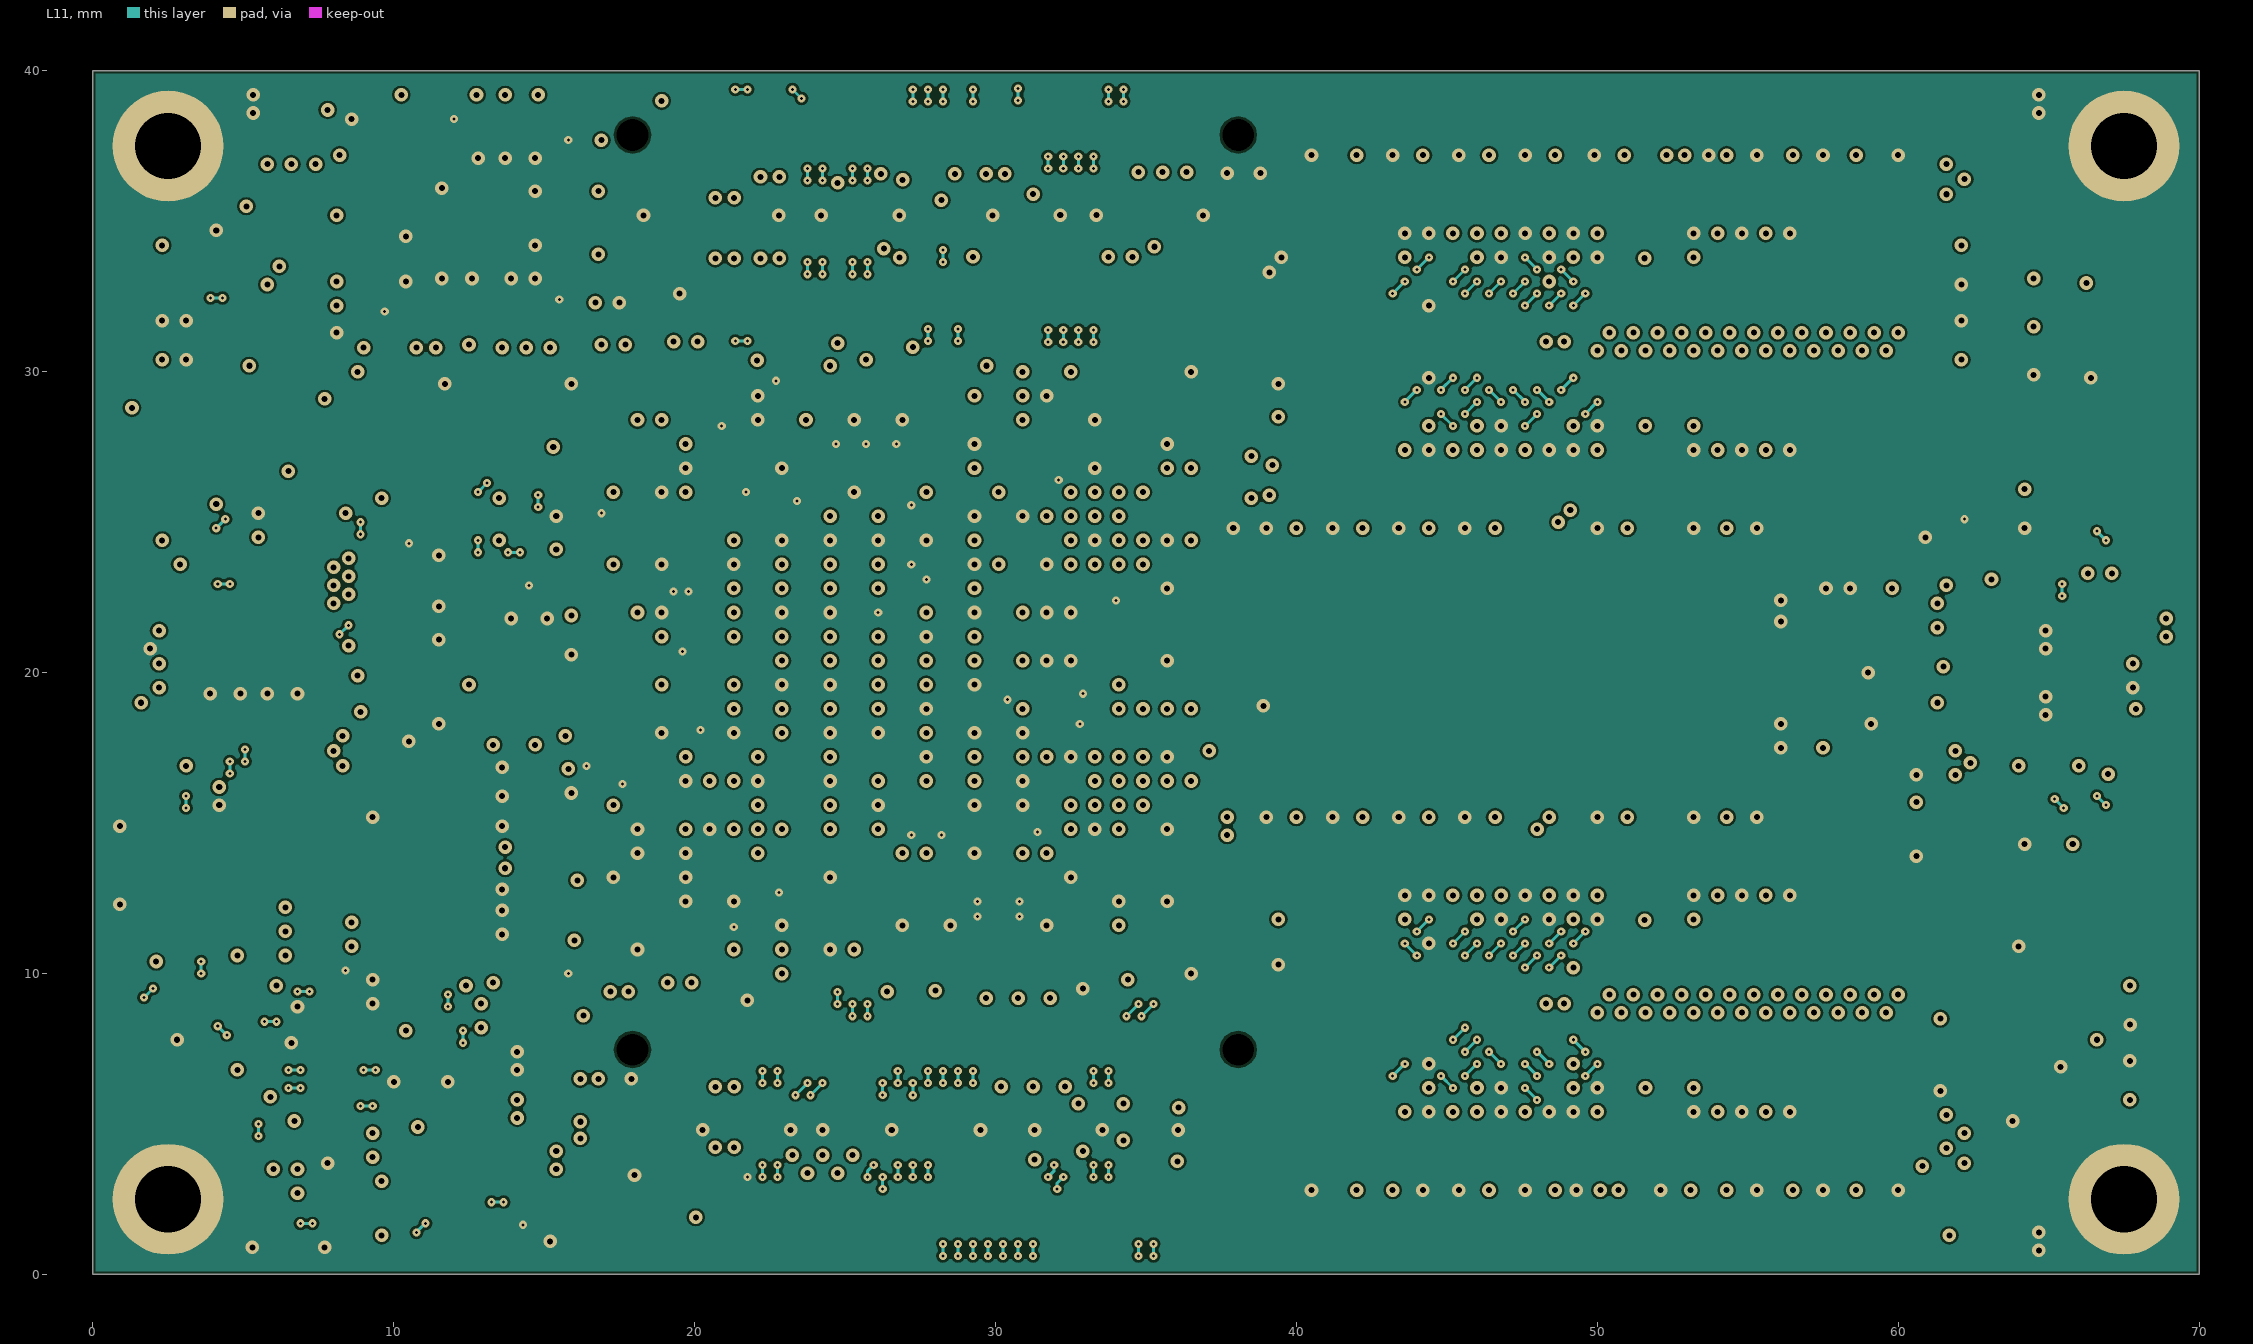
[diagram p11: L11]

## Layer stack, top to bottom
Top Solder: solder mask 0.0102, Solder Resist, Dk 3.5
L1: signal copper 0.038
Dielectric1: core 0.07, FR-4, Dk 4.8
L2: signal copper 0.038
Dielectric2: prepreg 0.092, FR-4, Dk 4.8
L3: signal copper 0.038
Dielectric3: core 0.2, FR-4, Dk 4.8
L4: plane copper 0.015, net GND
Dielectric10: prepreg 0.102, FR-4, Dk 4.8
L5 (PWR): signal copper 0.015
Dielectric9: core 0.1, FR-4, Dk 4.8
L6 (PWR): signal copper 0.015
Dielectric4: prepreg 0.118, FR-4, Dk 4.8
L7 (PWR): signal copper 0.015
Dielectric5: core 0.1, FR-4, Dk 4.8
L8 (PWR): signal copper 0.015
Dielectric8: prepreg 0.102, FR-4, Dk 4.8
L9: plane copper 0.015, net GND
Dielectric11: core 0.2, FR-4, Dk 4.8
L10: signal copper 0.038
Dielectric6: prepreg 0.093, FR-4, Dk 4.8
L11: signal copper 0.038
Dielectric7: core 0.071, FR-4, Dk 4.8
L12: signal copper 0.038
Bottom Solder: solder mask 0.0102, Solder Resist, Dk 3.5

## Board outline
0,0 0,40 70,40 70,0 0,0

## Design rules (kind name [scope] priority, off if disabled: settings)
Clearance "Poly GND to Via" [(IsRegion AND (OnLayer('L2') OR OnLayer('L11'))) vs IsVia AND (HoleSize  <> 0.1)] p1: gap=0.075
Clearance "Poly L2 & L11 to All" [(IsRegion AND (OnLayer('L2') OR OnLayer('L11')))] p2: gap=0.085
Clearance "Poly PWR to Via" [IsRegion AND (OnLayer('L5 (PWR)') OR OnLayer('L6 (PWR)') OR OnLayer('L7 (PWR)') OR OnLayer('L8 (PWR)') ) vs IsVia] p3: gap=0.075
Clearance "Poly to Poly" [IsRegion AND (OnLayer('L5 (PWR)') OR OnLayer('L6 (PWR)') OR OnLayer('L7 (PWR)') OR OnLayer('L8 (PWR)') ) vs IsRegion] p4: gap=0.2
Clearance "Clearance Plated Hole" [(InPadClass('NPTH'))] p5: gap=0.2
Clearance Clearence [All] p6: gap=0.1
ComponentClearance [All] p1: gap=0.1 collisioncheckmode=3 verticalgap=0.1 showdistances=FALSE
DiffPairsRouting DiffPair_DIFF100DiffPairsRouting [InDifferentialPairClass('DIFF100')] p1: maxlimit=0.22 minlimit=0.1 mostfreqgap=0.1 toplayer_mingap=0.135 toplayer_maxgap=0.185 toplayer_prefgap=0.16 toplayer_minwidth=0.09 toplayer_maxwidth=0.09 toplayer_prefwidth=0.09 midlayer1_maxgap=0.1 midlayer1_minwidth=0.1 midlayer1_maxwidth=0.1 midlayer1_prefwidth=0.1 midlayer2_mingap=0.17 midlayer2_prefgap=0.195 midlayer2_minwidth=0.085 midlayer2_maxwidth=0.085 midlayer2_prefwidth=0.085 midlayer3_maxgap=0.1 midlayer3_minwidth=0.1 midlayer3_maxwidth=0.1 midlayer3_prefwidth=0.1 midlayer4_maxgap=0.1 midlayer4_minwidth=0.1 midlayer4_maxwidth=0.1 midlayer4_prefwidth=0.1 midlayer5_mingap=0.17 midlayer5_prefgap=0.195 midlayer5_minwidth=0.085 midlayer5_maxwidth=0.085 midlayer5_prefwidth=0.085 midlayer6_maxgap=0.1 midlayer6_minwidth=0.1 midlayer6_maxwidth=0.1 midlayer6_prefwidth=0.1 midlayer7_maxgap=0.1 midlayer7_minwidth=0.1 midlayer7_maxwidth=0.1 midlayer7_prefwidth=0.1 midlayer8_maxgap=0.1 midlayer8_minwidth=0.1 midlayer8_maxwidth=0.1 midlayer8_prefwidth=0.1 bottomlayer_mingap=0.135 bottomlayer_maxgap=0.185 bottomlayer_prefgap=0.16 bottomlayer_minwidth=0.09 bottomlayer_maxwidth=0.09 bottomlayer_prefwidth=0.09 maxuncoupledlength=8.7
DiffPairsRouting DiffPair_DIFF90DiffPairsRouting [InDifferentialPairClass('DIFF90')] p2: maxlimit=0.19 minlimit=0.1 mostfreqgap=0.1 toplayer_mingap=0.109 toplayer_prefgap=0.114 toplayer_minwidth=0.101 toplayer_maxwidth=0.101 toplayer_prefwidth=0.101 midlayer1_maxgap=0.1 midlayer1_minwidth=0.1 midlayer1_maxwidth=0.1 midlayer1_prefwidth=0.1 midlayer2_mingap=0.11 midlayer2_maxgap=0.12 midlayer2_prefgap=0.115 midlayer2_minwidth=0.085 midlayer2_maxwidth=0.085 midlayer2_prefwidth=0.085 midlayer3_maxgap=0.1 midlayer3_minwidth=0.1 midlayer3_maxwidth=0.1 midlayer3_prefwidth=0.1 midlayer4_maxgap=0.1 midlayer4_minwidth=0.1 midlayer4_maxwidth=0.1 midlayer4_prefwidth=0.1 midlayer5_mingap=0.11 midlayer5_maxgap=0.12 midlayer5_prefgap=0.115 midlayer5_minwidth=0.085 midlayer5_maxwidth=0.085 midlayer5_prefwidth=0.085 midlayer6_maxgap=0.1 midlayer6_minwidth=0.1 midlayer6_maxwidth=0.1 midlayer6_prefwidth=0.1 midlayer7_maxgap=0.1 midlayer7_minwidth=0.1 midlayer7_maxwidth=0.1 midlayer7_prefwidth=0.1 midlayer8_maxgap=0.1 midlayer8_minwidth=0.1 midlayer8_maxwidth=0.1 midlayer8_prefwidth=0.1 bottomlayer_mingap=0.109 bottomlayer_maxgap=0.119 bottomlayer_prefgap=0.114 bottomlayer_minwidth=0.101 bottomlayer_maxwidth=0.101 bottomlayer_prefwidth=0.101 maxuncoupledlength=8
DiffPairsRouting [All] p3: maxlimit=0.1 minlimit=0.1 mostfreqgap=0.1 toplayer_minwidth=0.381 toplayer_maxwidth=0.381 toplayer_prefwidth=0.381 midlayer1_minwidth=0.381 midlayer1_maxwidth=0.381 midlayer1_prefwidth=0.381 midlayer2_minwidth=0.381 midlayer2_maxwidth=0.381 midlayer2_prefwidth=0.381 midlayer3_minwidth=0.381 midlayer3_maxwidth=0.381 midlayer3_prefwidth=0.381 midlayer4_minwidth=0.381 midlayer4_maxwidth=0.381 midlayer4_prefwidth=0.381 midlayer5_minwidth=0.381 midlayer5_maxwidth=0.381 midlayer5_prefwidth=0.381 midlayer6_minwidth=0.381 midlayer6_maxwidth=0.381 midlayer6_prefwidth=0.381 midlayer7_minwidth=0.381 midlayer7_maxwidth=0.381 midlayer7_prefwidth=0.381 midlayer8_minwidth=0.381 midlayer8_maxwidth=0.381 midlayer8_prefwidth=0.381 bottomlayer_minwidth=0.381 bottomlayer_maxwidth=0.381 bottomlayer_prefwidth=0.381 maxuncoupledlength=12.7
HoleSize [All] p1: absolutevalues=TRUE maxlimit=6 minlimit=0.025 maxpercent=80.000 minpercent=20.000
HoleToHoleClearance [All] p1: gap=0.1 allowstackedmicrovias=TRUE
MatchedLengths DiffPair_DIFF100MatchedLengths [InDifferentialPairClass('DIFF100')] p1: tolerance=0.127 checknetsindiffpair=TRUE checkdiffpairvsdiffpair=FALSE checkothers=FALSE
MatchedLengths DiffPair_DIFF90MatchedLengths [InDifferentialPairClass('DIFF90')] p2: tolerance=0.127 checknetsindiffpair=TRUE checkdiffpairvsdiffpair=FALSE checkothers=FALSE
MinimumSolderMaskSliver [All] p1: minsoldermaskwidth=0.1
PlaneClearance [All] p1: clearance=0.1
PlaneConnect [All] p1: planeconnectstyle=Direct reliefexpansion=0.508 reliefentries=4 reliefconductorwidth=0.254 reliefairgap=0.1
PolygonConnect [All] p1: connectstyle=Direct reliefconductorwidth=0.254 reliefentries=4 polygonreliefangle="90 Angle" airgapwidth=0.1
RoutingVias [All] p1: holewidth=0.2 width=0.45 viastyle="Through Hole" minholewidth=0.1 minwidth=0 maxholewidth=0.6 maxwidth=0.8
SilkToSilkClearance [All] p1: silktosilkclearance=0.1
SilkToSolderMaskClearance SilkscreenOverComponentPads [IsPad] p1: minsilkscreentomaskgap=0.1 clearancetoexposedcopper=TRUE
SolderMaskExpansion [All] p1: expansion=0.102
UnpouredPolygon [All] p1: allowunpoured=FALSE
Width DiffPair_DIFF100Width [InDifferentialPairClass('DIFF100')] p1: maxlimit=0.1 minlimit=0.085 preferedwidth=0.1 toplayer_minwidth=0.09 toplayer_maxwidth=0.09 toplayer_prefwidth=0.09 midlayer1_minwidth=0.1 midlayer2_maxwidth=0.085 midlayer2_prefwidth=0.085 midlayer3_minwidth=0.1 midlayer4_minwidth=0.1 midlayer5_maxwidth=0.085 midlayer5_prefwidth=0.085 midlayer6_minwidth=0.1 midlayer7_minwidth=0.1 midlayer8_minwidth=0.1 bottomlayer_minwidth=0.09 bottomlayer_maxwidth=0.09 bottomlayer_prefwidth=0.09 minimp=50.000000 maximp=50.000000 favimp=50.000000
Width DiffPair_DIFF90Width [InDifferentialPairClass('DIFF90')] p2: maxlimit=0.101 minlimit=0.085 preferedwidth=0.1 toplayer_minwidth=0.101 toplayer_prefwidth=0.101 midlayer1_minwidth=0.1 midlayer1_maxwidth=0.1 midlayer2_maxwidth=0.085 midlayer2_prefwidth=0.085 midlayer3_minwidth=0.1 midlayer3_maxwidth=0.1 midlayer4_minwidth=0.1 midlayer4_maxwidth=0.1 midlayer5_maxwidth=0.085 midlayer5_prefwidth=0.085 midlayer6_minwidth=0.1 midlayer6_maxwidth=0.1 midlayer7_minwidth=0.101 midlayer7_prefwidth=0.101 midlayer8_minwidth=0.101 midlayer8_prefwidth=0.101 bottomlayer_minwidth=0.101 bottomlayer_prefwidth=0.101 minimp=50.000000 maximp=50.000000 favimp=50.000000
Width "Width Ground" [InNet('GND')] p3: maxlimit=4 minlimit=0.2 preferedwidth=0.3
Width "Width Power" [InNet('+VIN') OR InNet('+1V2_ETH') OR InNet('+1V5_DDR') OR InNet('+1V375') OR InNet('+2V5') OR InNet('+3V3')] p4: maxlimit=4 minlimit=0.2 preferedwidth=0.3
Width [All] p5: maxlimit=4 minlimit=0.08 preferedwidth=0.1
20 further rules are at their usual default settings.

## Classes and differential pairs
net class RGMII_RXD: RGMII_R_RXCLK RGMII_RXCLK RGMII_RXD0 RGMII_RXD1 RGMII_RXD2 RGMII_RXD3 RGMII_RXDV
net class RGMII_MISC: RGMII_INT RGMII_INT_R RGMII_MDC RGMII_MDIO RGMII_R_MDC RGMII_R_MDIO
differential pair class DIFF100: CLK1 CLK1_C DRAM_CLK0 DRAM_CLK1 DRAM_DQS0 DRAM_DQS1 DRAM_DQS2 DRAM_DQS3 DRAM_DQS4 DRAM_DQS5 DRAM_DQS6 DRAM_DQS7 HDMI_CLK HDMI_D0 HDMI_D1 HDMI_D2 LVDS0_CLK LVDS0_TX0 LVDS0_TX1 LVDS0_TX2 LVDS0_TX3 SATA_C_RX SATA_C_TX SATA_RX SATA_TX TRD0 TRD1 TRD2 TRD3
differential pair class DIFF90: PCIE_C_TX PCIE_RX PCIE_TX USB0 USB1
net class SATA: SATA_C_RX_N SATA_C_RX_P SATA_C_TX_N SATA_C_TX_P SATA_REXT SATA_RX_N SATA_RX_P SATA_TX_N SATA_TX_P
net class DRAM_D[63..0]: DRAM_D0 DRAM_D1 DRAM_D2 DRAM_D3 DRAM_D4 DRAM_D5 DRAM_D6 DRAM_D7 DRAM_D8 DRAM_D9 DRAM_D10 DRAM_D11 DRAM_D12 DRAM_D13 DRAM_D14 DRAM_D15 DRAM_D16 DRAM_D17 DRAM_D18 DRAM_D19 DRAM_D20 DRAM_D21 DRAM_D22 DRAM_D23 DRAM_D24 DRAM_D25 DRAM_D26 DRAM_D27 DRAM_D28 DRAM_D29 DRAM_D30 DRAM_D31 DRAM_D32 DRAM_D33 DRAM_D34 DRAM_D35 DRAM_D36 DRAM_D37 DRAM_D38 DRAM_D39 DRAM_D40 DRAM_D41 DRAM_D42 DRAM_D43 DRAM_D44 DRAM_D45 DRAM_D46 DRAM_D47 DRAM_D48 DRAM_D49 DRAM_D50 DRAM_D51 DRAM_D52 DRAM_D53 DRAM_D54 DRAM_D55 DRAM_D56 DRAM_D57 DRAM_D58 DRAM_D59 DRAM_D60 DRAM_D61 DRAM_D62 DRAM_D63
net class USB1: USB1_N USB1_P USB1_PWR_EN
net class USB0: USB0_ID USB0_N USB0_P USB0_PWR_EN USB_OC
net class UART2: UART2_CTS UART2_RTS UART2_RXD UART2_TXD
net class UART1: UART1_CTS UART1_DCD UART1_DSR UART1_DTR UART1_RI UART1_RTS UART1_RXD UART1_TXD
net class SPI2: CSPI2_CLK CSPI2_CLK_R CSPI2_CS0 CSPI2_MISO CSPI2_MOSI
net class SPI3: CSPI3_CLK CSPI3_CLK_R CSPI3_CS2 CSPI3_MISO CSPI3_MOSI
net class MMC_CARD: SD2_ACT SD2_CD SD2_CLK SD2_CLK_R SD2_CMD SD2_CMD_R SD2_DATA0 SD2_DATA1 SD2_DATA2 SD2_DATA3 SD2_DATA4 SD2_DATA5 SD2_DATA6 SD2_DATA7 SD2_WP
net class RGMII_TXD: RGMII_R_TXCLK RGMII_TXCLK RGMII_TXD0 RGMII_TXD1 RGMII_TXD2 RGMII_TXD3 RGMII_TXEN
net class PCIE: CLK1_C_N CLK1_C_P CLK1_N CLK1_P PCIE_C_TX_N PCIE_C_TX_P PCIE_RX_N PCIE_RX_P PCIE_TX_N PCIE_TX_P PCIE_WAKE
net class SD_CARD: SD3_CD SD3_CLK SD3_CLK_R SD3_CMD SD3_CMD_R SD3_DATA0 SD3_DATA1 SD3_DATA2 SD3_DATA3 SD3_WP
net class LVDS: I2C3_SCL I2C3_SDA LVDS0_CABC LVDS0_CLK_N LVDS0_CLK_P LVDS0_PWM LVDS0_TX0_N LVDS0_TX0_P LVDS0_TX1_N LVDS0_TX1_P LVDS0_TX2_N LVDS0_TX2_P LVDS0_TX3_N LVDS0_TX3_P
net class JTAG: JTAG_MOD JTAG_NTRST JTAG_TCK JTAG_TCK_R JTAG_TDI JTAG_TDI_R JTAG_TDO JTAG_TDO_R JTAG_TMS
net class I2C: I2C4_SCL I2C4_SDA
net class HDMI: HDMI_CEC HDMI_CEC_IN HDMI_CLK_N HDMI_CLK_P HDMI_D0_N HDMI_D0_P HDMI_D1_N HDMI_D1_P HDMI_D2_N HDMI_D2_P HDMI_DDC HDMI_HPD I2C2_SCL I2C2_SDA
net class ENET: ENET_LED_LINK ENET_LED_RX ENET_REF_CLK ENET_REF_CLK_R ETH_ISET LED1 LED2 TRD0_N TRD0_P TRD1_N TRD1_P TRD2_N TRD2_P TRD3_N TRD3_P
net class DRAM_A[15..0]: DRAM_A0 DRAM_A1 DRAM_A2 DRAM_A3 DRAM_A4 DRAM_A5 DRAM_A6 DRAM_A7 DRAM_A8 DRAM_A9 DRAM_A10 DRAM_A11 DRAM_A12 DRAM_A13 DRAM_A14 DRAM_A15
net class DIFF100: CLK1_C_N CLK1_C_P CLK1_N CLK1_P DRAM_CLK0_N DRAM_CLK0_P DRAM_CLK1_N DRAM_CLK1_P DRAM_DQS0_N DRAM_DQS0_P DRAM_DQS1_N DRAM_DQS1_P DRAM_DQS2_N DRAM_DQS2_P DRAM_DQS3_N DRAM_DQS3_P DRAM_DQS4_N DRAM_DQS4_P DRAM_DQS5_N DRAM_DQS5_P DRAM_DQS6_N DRAM_DQS6_P DRAM_DQS7_N DRAM_DQS7_P HDMI_CLK_N HDMI_CLK_P HDMI_D0_N HDMI_D0_P HDMI_D1_N HDMI_D1_P HDMI_D2_N HDMI_D2_P LVDS0_CLK_N LVDS0_CLK_P LVDS0_TX0_N LVDS0_TX0_P LVDS0_TX1_N LVDS0_TX1_P LVDS0_TX2_N LVDS0_TX2_P LVDS0_TX3_N LVDS0_TX3_P SATA_C_RX_N SATA_C_RX_P SATA_C_TX_N SATA_C_TX_P SATA_RX_N SATA_RX_P SATA_TX_N SATA_TX_P TRD0_N TRD0_P TRD1_N TRD1_P TRD2_N TRD2_P TRD3_N TRD3_P
net class DIFF90: PCIE_C_TX_N PCIE_C_TX_P PCIE_RX_N PCIE_RX_P PCIE_TX_N PCIE_TX_P USB0_N USB0_P USB1_N USB1_P
net class Audio: AUD3_CLK AUD3_CLK_R AUD3_RXD AUD3_TXC AUD3_TXC_R AUD3_TXD AUD3_TXFS I2C1_SCL I2C1_SDA
component class "[17] - MECH": FID1 FID2 FID3 FID4 MH1 MH2 MH3 MH4 TP10
component class "[16] - PWR 2V5, 1V5": C223 C224 C225 C226 C227 C228 C229 C230 C231 C233 C234 C235 C236 C237 C238 L4 L5 Q6 Q7 R134 R135 R140 R141 R142 R145 R146 R147 R148 R149 R150 R151 R152 R153 R154 R155 R158 R163 R164 TP8 TP9 U13
component class "[15] - PWR 3V3, 1V375": C204 C205 C206 C207 C208 C209 C210 C211 C212 C213 C214 C215 C216 C217 C218 C219 C220 C221 C222 C232 L1 L2 L3 Q3 Q4 Q5 Q8 R93 R106 R107 R108 R116 R117 R118 R119 R120 R121 R122 R123 R124 R125 R126 R127 R128 R129 R130 R131 R132 R133 R136 R138 R139 TP6 TP7 TP11 U11 U12
component class "[14] - SPI FLASH, LEDS": C203 D2 D3 Q1 Q2 R109 R110 R113 R114 R115 U10
component class "[13] - ETHERNET PHY": C175 C176 C177 C178 C179 C180 C181 C182 C183 C184 C185 C186 C187 C188 C189 C190 C191 C192 C193 C194 C195 C196 C197 C198 C199 C200 C201 C202 C248 C249 FB3 FB4 FB5 FB6 FB7 FB8 R36 R75 R81 R82 R83 R84 R85 R86 R87 R89 R91 R94 R95 R96 R97 R98 R99 R101 R102 R162 TP5 U8 U9 Y3
component class "[11] - CPU - POWER": C90 C91 C92 C93 C94 C95 C96 C97 C98 C99 C100 C101 C102 C103 C104 C105 C106 C107 C108 C109 C110 C111 C112 C113 C114 C115 C116 C117 C118 C119 C120 C121 C122 C123 C124 C125 C126 C127 C128 C129 C130 C131 C132 C133 C134 C135 C136 C137 C138 C139 C140 C141 C142 C143 C144 C145 C146 C147 C148 C149 C150 C151 C152 C153 C154 C155 C156 C157 C158 C159 C160 C161 C162 C163 C164 C165 C166 C167 C168 C169 C170 C171 C172 C173 C174 FB2 R74 R76 R77 R78 R79 R80 R105
component class "[10] - CPU - JTAG, CONTROL": C83 C84 C85 C86 C87 C88 C89 D1 Q9 R37 R48 R49 R51 R53 R54 R55 R56 R57 R58 R59 R60 R61 R62 R63 R64 R65 R67 R68 R69 R70 R71 R73 R90 R92 R103 R104 R111 R137 R143 R144 R161 R165 TP3 U1 U6 U7 Y1 Y2
component class "[09] - CPU - UART, AUDIO": R46 R47 R72 R160
component class "[08] - CPU - SPI, I2C, SD, MMC": R1 R38 R39 R40 R41 R42 R43 R44 R45 R50 R52 R66 R112 R156 R157 R159
component class "[07] - CPU - USB, ETHERNET": C79 C80 C81 C82 R35 R88 R100
component class "[06] - CPU - HDMI, LVDS": C74 C75 C76 C77 C243 C246 C247 R21 R22 R23 R24 R25 R26 R27 R28 R29 R30 R31 R32 R33 R34
component class "[05] - CPU - PCIE, SATA": C61 C62 C63 C64 C65 C66 C67 C68 C69 C70 C71 C72 C73 C78 C244 C245 FB1 R13 R14 R15 R16 R17 R18 R19 R20
component class "[04] - CPU - DDR3, DDR3 MEM": C3 C4 C5 C6 C7 C8 C9 C10 C11 C12 C13 C14 C15 C16 C17 C18 C19 C20 C21 C22 C23 C24 C25 C26 C27 C28 C29 C30 C31 C32 C33 C34 C35 C36 C37 C38 C39 C40 C41 C42 C43 C44 C45 C46 C47 C48 C49 C50 C51 C52 C53 C54 C55 C56 C57 C58 C59 C60 R2 R3 R4 R5 R6 R7 R8 R9 R10 R11 R12 U2 U3 U4 U5
component class "[03] - CONNECTORS": C1 C2 C239 C240 C241 C242 J1 J2
net class DRAM_ADDR_CTRL: DRAM_A0 DRAM_A1 DRAM_A2 DRAM_A3 DRAM_A4 DRAM_A5 DRAM_A6 DRAM_A7 DRAM_A8 DRAM_A9 DRAM_A10 DRAM_A11 DRAM_A12 DRAM_A13 DRAM_A14 DRAM_A15 DRAM_CAS_B DRAM_CS0_B DRAM_RAS_B DRAM_RESET_B DRAM_SDBA0 DRAM_SDBA1 DRAM_SDBA2 DRAM_SDCKE0 DRAM_SDODT0 DRAM_WE_B
net class DRAM_BANK0: DRAM_D0 DRAM_D1 DRAM_D2 DRAM_D3 DRAM_D4 DRAM_D5 DRAM_D6 DRAM_D7 DRAM_DQM0 DRAM_DQS0_N DRAM_DQS0_P
net class DRAM_BANK1: DRAM_D8 DRAM_D9 DRAM_D10 DRAM_D11 DRAM_D12 DRAM_D13 DRAM_D14 DRAM_D15 DRAM_DQM1 DRAM_DQS1_N DRAM_DQS1_P
net class DRAM_BANK2: DRAM_D16 DRAM_D17 DRAM_D18 DRAM_D19 DRAM_D20 DRAM_D21 DRAM_D22 DRAM_D23 DRAM_DQM2 DRAM_DQS2_N DRAM_DQS2_P
net class DRAM_BANK3: DRAM_D24 DRAM_D25 DRAM_D26 DRAM_D27 DRAM_D28 DRAM_D29 DRAM_D30 DRAM_D31 DRAM_DQM3 DRAM_DQS3_N DRAM_DQS3_P
net class DRAM_BANK4: DRAM_D32 DRAM_D33 DRAM_D34 DRAM_D35 DRAM_D36 DRAM_D37 DRAM_D38 DRAM_D39 DRAM_DQM4 DRAM_DQS4_N DRAM_DQS4_P
net class DRAM_BANK5: DRAM_D40 DRAM_D41 DRAM_D42 DRAM_D43 DRAM_D44 DRAM_D45 DRAM_D46 DRAM_D47 DRAM_DQM5 DRAM_DQS5_N DRAM_DQS5_P
net class DRAM_BANK6: DRAM_D48 DRAM_D49 DRAM_D50 DRAM_D51 DRAM_D52 DRAM_D53 DRAM_D54 DRAM_D55 DRAM_DQM6 DRAM_DQS6_N DRAM_DQS6_P
net class DRAM_BANK7: DRAM_D56 DRAM_D57 DRAM_D58 DRAM_D59 DRAM_D60 DRAM_D61 DRAM_D62 DRAM_D63 DRAM_DQM7 DRAM_DQS7_N DRAM_DQS7_P
net class DRAM_SDCLK: DRAM_CLK0_N DRAM_CLK0_P DRAM_CLK1_N DRAM_CLK1_P
net class DRAM_OTHERS: ZQPAD
differential pair LVDS0_TX3: +LVDS0_TX3_P -LVDS0_TX3_N
differential pair SATA_TX: +SATA_TX_P -SATA_TX_N
differential pair SATA_RX: +SATA_RX_P -SATA_RX_N
differential pair PCIE_TX: +PCIE_TX_P -PCIE_TX_N
differential pair CLK1: +CLK1_P -CLK1_N
differential pair SATA_C_TX: +SATA_C_TX_P -SATA_C_TX_N
differential pair SATA_C_RX: +SATA_C_RX_P -SATA_C_RX_N
differential pair PCIE_RX: +PCIE_RX_P -PCIE_RX_N
differential pair PCIE_C_TX: +PCIE_C_TX_P -PCIE_C_TX_N
differential pair CLK1_C: +CLK1_C_P -CLK1_C_N
differential pair USB1: +USB1_P -USB1_N
differential pair USB0: +USB0_P -USB0_N
differential pair TRD3: +TRD3_P -TRD3_N
differential pair TRD2: +TRD2_P -TRD2_N
differential pair TRD1: +TRD1_P -TRD1_N
differential pair TRD0: +TRD0_P -TRD0_N
differential pair LVDS0_TX2: +LVDS0_TX2_P -LVDS0_TX2_N
differential pair LVDS0_TX1: +LVDS0_TX1_P -LVDS0_TX1_N
differential pair LVDS0_TX0: +LVDS0_TX0_P -LVDS0_TX0_N
differential pair LVDS0_CLK: +LVDS0_CLK_P -LVDS0_CLK_N
differential pair HDMI_D2: +HDMI_D2_P -HDMI_D2_N
differential pair HDMI_D1: +HDMI_D1_P -HDMI_D1_N
differential pair HDMI_D0: +HDMI_D0_P -HDMI_D0_N
differential pair HDMI_CLK: +HDMI_CLK_P -HDMI_CLK_N
differential pair DRAM_DQS0: +DRAM_DQS0_P -DRAM_DQS0_N
differential pair DRAM_DQS1: +DRAM_DQS1_P -DRAM_DQS1_N
differential pair DRAM_DQS2: +DRAM_DQS2_P -DRAM_DQS2_N
differential pair DRAM_DQS3: +DRAM_DQS3_P -DRAM_DQS3_N
differential pair DRAM_DQS4: +DRAM_DQS4_P -DRAM_DQS4_N
differential pair DRAM_DQS5: +DRAM_DQS5_P -DRAM_DQS5_N
differential pair DRAM_DQS6: +DRAM_DQS6_P -DRAM_DQS6_N
differential pair DRAM_DQS7: +DRAM_DQS7_P -DRAM_DQS7_N
differential pair DRAM_CLK0: +DRAM_CLK0_P -DRAM_CLK0_N
differential pair DRAM_CLK1: +DRAM_CLK1_P -DRAM_CLK1_N

## Components (designator, comment, footprint, x,y, rotation, side; value= is the part's Value field where it differs from the comment)
C1 "1u" C0402 24.2,9.8 r0 bottom
C2 "10uF" C1206 36.7,35.4 r0 top
C3 "220n" C0402 50.5,15.9 r180 top
C4 "220n" C0402 52.6,2.1 r180 top
C5 "220n" C0402 50.5,15.9 r180 bottom
C6 "220n" C0402 52.6,2.1 r180 bottom
C7 "100n" C0402 35.2,11.7 r0 bottom
C8 "220n" C0402 50.4,37.9 r180 top
C9 "220n" C0402 50.5,24.1 r180 top
C10 "220n" C0402 50.4,37.9 r180 bottom
C11 "220n" C0402 50.5,24.1 r180 bottom
C12 "22u" C0603 38.6,11.1 r270 top
C13 "22u" C0603 59.6,1.9 r0 top
C14 "22u" C0603 41,1.9 r180 top
C15 "22u" C0603 41,38.1 r180 top
C16 "22u" C0603 59.6,38.1 r0 top
C17 "22u" C0603 38.6,29 r90 top
C18 "100n" C0402 63.9,32.6 r270 bottom
C19 "10u" C0603 66.5,31.4 r270 bottom
C20 "100n" C0402 63.9,30.4 r270 bottom
C21 "220n" C0402 57,2.1 r0 top
C22 "220n" C0402 54.8,15.9 r0 top
C23 "220n" C0402 46.1,15.9 r180 top
C24 "220n" C0402 41.7,15.9 r180 top
C25 "220n" C0402 43.9,15.9 r180 top
C26 "220n" C0402 39.5,15.9 r180 top
C27 "220n" C0402 43.7,2.1 r0 top
C28 "220n" C0402 45.9,2.1 r180 top
C29 "220n" C0402 48.1,2.1 r180 top
C30 "220n" C0402 54.8,2.1 r0 top
C31 "220n" C0402 43.9,24.1 r180 top
C32 "220n" C0402 54.8,24.1 r0 top
C33 "220n" C0402 46.1,24.1 r180 top
C34 "220n" C0402 48.1,37.9 r180 top
C35 "220n" C0402 57,37.9 r0 top
C36 "220n" C0402 43.7,37.9 r180 top
C37 "220n" C0402 45.9,37.9 r180 top
C38 "220n" C0402 54.8,37.9 r0 top
C39 "220n" C0402 39.5,24.1 r180 top
C40 "220n" C0402 41.7,24.1 r180 top
C41 "220n" C0402 57,2.1 r0 bottom
C42 "220n" C0402 54.8,15.9 r0 bottom
C43 "220n" C0402 41.7,15.9 r180 bottom
C44 "220n" C0402 46.1,15.9 r180 bottom
C45 "220n" C0402 43.9,15.9 r180 bottom
C46 "220n" C0402 39.5,15.9 r180 bottom
C47 "220n" C0402 43.7,2.1 r0 bottom
C48 "220n" C0402 48.1,2.1 r180 bottom
C49 "220n" C0402 45.9,2.1 r180 bottom
C50 "220n" C0402 54.8,2.1 r0 bottom
C51 "220n" C0402 41.7,24.1 r180 bottom
C52 "220n" C0402 46.1,24.1 r180 bottom
C53 "220n" C0402 43.9,24.1 r180 bottom
C54 "220n" C0402 54.8,24.1 r0 bottom
C55 "220n" C0402 57,37.9 r0 bottom
C56 "220n" C0402 45.9,37.9 r180 bottom
C57 "220n" C0402 43.7,37.9 r180 bottom
C58 "220n" C0402 54.8,37.9 r0 bottom
C59 "220n" C0402 48.1,37.9 r180 bottom
C60 "220n" C0402 39.5,24.1 r180 bottom
C61 "220n" C0402 21.5,13.7 r270 bottom
C62 "220n" C0402 23.4,15.4 r0 bottom
C63 "100n" C0402 15.3,9.6 r270 top
C64 "220n" C0402 20.3,13.7 r270 bottom
C65 "100n" C0402 14.3,9.6 r270 top
C66 "100n" C0402 17.3,4.3 r0 top
C67 "100n" C0402 17.3,5.3 r0 top
C68 "220n" C0402 20.2,21.2 r180 bottom
C69 "10n" C0402 19.2,7.9 r270 top
C70 "10n" C0402 20.2,7.9 r270 top
C71 "10n" C0402 18,1.3 r0 top
C72 "10n" C0402 18,2.3 r0 top
C73 "220n" C0402 19.7,18.7 r270 bottom
C74 "100n" C0402 23.2,30.2 r0 bottom
C75 "220n" C0402 23.9,13.9 r270 bottom
C76 "220n" C0402 26.7,12.9 r270 bottom
C77 "220n" C0402 31.3,12.9 r270 bottom
C78 "4u7" C0402 19.4,11.3 r90 bottom
C79 "220n" C0402 18.6,16.4 r180 bottom
C80 "10u" C0603 16.6,14.6 r270 bottom
C81 "220n" C0402 19,15.4 r180 bottom
C82 "220n" C0402 16.8,17.4 r180 bottom
C83 "18p" C0402 14.2,15.3 r90 top
C84 "18p" C0402 14.2,12 r270 top
C85 "18p" C0402 15.1,20.7 r90 top
C86 "18p" C0402 13.9,20.7 r90 top
C87 "100n" C0402 66,7.3 r270 bottom
C88 "100n" C0402 61.4,7.3 r270 bottom
C89 "100n" C0402 5.9,7.3 r90 bottom
C90 "220n" C0402 25.5,15.9 r270 bottom
C91 "220n" C0402 25.6,17.4 r0 bottom
C92 "220n" C0402 22.1,20.8 r90 bottom
C93 "220n" C0402 23.7,20.9 r90 bottom
C94 "220n" C0402 25.3,20.9 r270 bottom
C95 "220n" C0402 26.9,21.1 r90 bottom
C96 "22u" C0603 30.1,12.9 r270 bottom
C97 "220n" C0402 28.3,21.1 r90 bottom
C98 "220n" C0402 20.2,20.2 r180 bottom
C99 "220n" C0402 25.3,18.9 r270 bottom
C100 "220n" C0402 23.4,17.4 r0 bottom
C101 "22u" C0603 17.4,19.8 r180 bottom
C102 "220n" C0402 29.8,18.6 r0 bottom
C103 "220n" C0402 21.9,18.8 r270 bottom
C104 "220n" C0402 23.9,18.9 r270 bottom
C105 "220n" C0402 28.3,19.1 r90 bottom
C106 "22u" C0603 30.1,16.7 r270 bottom
C107 "220n" C0402 26.7,15.1 r270 bottom
C108 "220n" C0402 27.7,15.1 r270 bottom
C109 "220n" C0402 28.7,15.1 r270 bottom
C110 "220n" C0402 30.3,14.8 r0 bottom
C111 "22u" C0603 17.4,21.2 r180 bottom
C112 "220n" C0402 30.4,19.6 r0 bottom
C113 "220n" C0402 28.2,22.6 r180 bottom
C114 "220n" C0402 29.9,22.5 r90 bottom
C115 "220n" C0402 28.3,17.1 r270 bottom
C116 "220n" C0402 27.1,17.1 r270 bottom
C117 "220n" C0402 30.3,21 r0 bottom
C118 "22u" C0603 32.9,21.2 r0 bottom
C119 "220n" C0402 28.2,25 r0 bottom
C120 "220n" C0402 26.7,23.1 r90 bottom
C121 "220n" C0402 28.2,23.6 r180 bottom
C122 "220n" C0402 21.9,24.9 r90 bottom
C123 "220n" C0402 23.7,22.9 r270 bottom
C124 "220n" C0402 25.3,22.9 r270 bottom
C125 "220n" C0402 21.2,26.5 r0 bottom
C126 "220n" C0402 22.1,22.8 r270 bottom
C127 "22u" C0603 20.6,28.8 r0 bottom
C128 "22u" C0603 16.2,25.7 r270 bottom
C129 "22u" C0603 28.5,27 r90 bottom
C130 "220n" C0402 26.7,25.1 r90 bottom
C131 "220n" C0402 22.9,25.7 r90 bottom
C132 "220n" C0402 21.2,27.5 r180 bottom
C133 "220n" C0402 25.3,24.9 r90 bottom
C134 "220n" C0402 23.9,24.9 r90 bottom
C135 "22u" C0603 22.9,28.3 r90 bottom
C136 "220n" C0402 23.4,16.4 r0 bottom
C137 "22u" C0805 14.8,19.8 r90 bottom
C138 "220n" C0402 26.9,19.1 r270 bottom
C139 "10n" C0402 21,17 r0 bottom
C140 "220n" C0402 18.3,18 r90 bottom
C141 "22u" C0805 14.7,15.8 r270 bottom
C142 "220n" C0402 20.7,18.5 r270 bottom
C143 "220n" C0402 21,15.4 r180 bottom
C144 "220n" C0402 26.2,27.1 r90 bottom
C145 "220n" C0402 27.9,12.9 r270 bottom
C146 "220n" C0402 25.2,27.1 r90 bottom
C147 "22u" C0805 31,10.4 r0 bottom
C148 "22u" C0805 16.8,28.9 r90 bottom
C149 "220n" C0402 25.1,13.9 r270 bottom
C150 "220n" C0402 19.1,13.9 r270 bottom
C151 "22u" C0603 17.5,12.2 r180 bottom
C152 "220n" C0402 20.1,25.4 r180 bottom
C153 "220n" C0402 17.4,24.9 r90 bottom
C154 "220n" C0402 20.2,23.2 r180 bottom
C155 "220n" C0402 27.2,27.1 r90 bottom
C156 "22u" C0805 27.5,29.5 r180 bottom
C157 "220n" C0402 30.9,24.1 r90 bottom
C158 "220n" C0402 32.1,16.6 r0 bottom
C159 "220n" C0402 29.9,24.7 r90 bottom
C160 "220n" C0402 29.9,27.1 r90 bottom
C161 "220n" C0402 31.9,15.1 r270 bottom
C162 "220n" C0402 32.1,17.8 r0 bottom
C163 "220n" C0402 28.9,12.9 r270 bottom
C164 "220n" C0402 20.2,22.2 r180 bottom
C165 "220n" C0402 20.1,24.2 r180 bottom
C166 "220n" C0402 24.2,27.1 r90 bottom
C167 "220n" C0402 31.4,25.9 r0 bottom
C168 "220n" C0402 31.5,22.6 r0 bottom
C169 "220n" C0402 32.4,18.8 r0 bottom
C170 "220n" C0402 32.4,19.8 r0 bottom
C171 "220n" C0402 33.5,22.9 r0 bottom
C172 "22u" C0603 35.7,19.6 r0 bottom
C173 "22u" C0603 31.8,27.1 r0 bottom
C174 "220n" C0402 22.7,13.7 r270 bottom
C175 "22pF" C0402 14.4,30.2 r0 bottom
C176 "22pF" C0402 12.2,30.2 r180 bottom
C177 "10u" C0603 2.4,29.6 r0 bottom
C178 "10u" C0603 5,34 r90 bottom
C179 "560pF" C0402 4.8,31.4 r270 bottom
C180 "10u" C0603 6.7,37.7 r180 bottom
C181 "100n" C0402 6.6,39 r180 bottom
C182 "10n" C0402 10.7,31.9 r90 bottom
C183 "10n" C0402 9.4,35.1 r0 bottom
C184 "10n" C0402 8.9,37.3 r90 bottom
C185 "10n" C0402 15.3,38.2 r270 bottom
C186 "10u" C0603 13.1,35.4 r180 bottom
C187 "100n" C0402 15.8,35.7 r180 bottom
C188 "10n" C0402 15.8,34.4 r180 bottom
C189 "10n" C0402 15.8,36.7 r180 bottom
C190 "100n" C0402 16,31.9 r90 bottom
C191 "10u" C0603 13.1,34 r0 bottom
C192 "100n" C0402 14,32 r90 bottom
C193 "10n" C0402 12.7,32 r90 bottom
C194 "10u" C0603 9.1,33.8 r0 bottom
C195 "100n" C0402 9.2,31.5 r0 bottom
C196 "10n" C0402 14.2,38.2 r270 bottom
C197 "10n" C0402 9.2,32.5 r0 bottom
C198 "10n" C0402 11.7,32 r90 bottom
C199 "10u" C0603 20.6,30.2 r0 bottom
C200 "10n" C0402 15.8,33.4 r180 bottom
C201 "10n" C0402 16.3,38.2 r270 bottom
C202 "10n" C0402 15,31.9 r90 bottom
C203 "100n" C0402 29.3,7.7 r270 top
C204 "10u" C0603 8.5,15.4 r270 bottom
C205 "100n" C0402 9.4,17.6 r0 bottom
C206 "1u" C0402 1.3,20.1 r90 bottom
C207 "1u" C0402 10.4,22 r0 bottom
C208 "1uF" C0805 10.7,19.2 r0 bottom
C209 "10uF" C1206 6.5,2.6 r270 top
C210 "10uF" C1206 6.5,37.3 r90 top
C211 "100n" C0402 1.9,16.4 r180 bottom
C212 "100n" C0402 1.8,23.8 r0 bottom
C213 "100µF" C1206 11.3,13.9 r0 top
C214 "100µF" C1206 11.3,16.4 r0 top
C215 "100µF" C1206 11.3,11.4 r0 top
C216 "100µF" C1206 6.7,20 r270 top
C217 "100µF" C1206 4.2,20 r270 top
C218 "10n" C0402 10.4,20.9 r0 bottom
C219 "100n" C0402 9.9,23.5 r0 bottom
C220 "10uF" C1206 10.1,9 r180 top
C221 "10u" C0603 13.3,6.3 r90 top
C222 "10u" C0603 14.9,6.3 r90 top
C223 "10u" C0603 59.6,23.7 r180 bottom
C224 "100n" C0402 61.6,24 r90 bottom
C225 "1u" C0402 68.5,20 r270 bottom
C226 "1u" C0402 60.2,18.5 r180 bottom
C227 "1uF" C0805 59.3,21.7 r180 bottom
C228 "10uF" C1206 63.5,37.4 r90 top
C229 "10uF" C1206 63.5,2.6 r270 top
C230 "100n" C0402 68,24.6 r0 bottom
C231 "100n" C0402 68.2,16.1 r180 bottom
C232 "100µF" C1206 10.1,20 r270 top
C233 "100µF" C1206 58.6,21.2 r180 top
C234 "100µF" C1206 64.1,21.1 r0 top
C235 "100µF" C1206 64.1,18.9 r0 top
C236 "100µF" C1206 58.6,18.7 r180 top
C237 "10n" C0402 60.2,20 r180 bottom
C238 "100n" C0402 60.2,17.3 r180 bottom
C239 "100n" C0402 33.9,36.9 r270 top
C240 "100n" C0402 33.9,34.9 r90 top
C241 "10uF" C1206 36.7,32.8 r0 top
C242 "100n" C0402 30.6,35.2 r270 top
C243 "4u7" C0402 33,12.6 r0 bottom
C244 "4u7" C0402 16.3,10 r90 bottom
C245 "4u7" C0402 35.2,10.6 r0 bottom
C246 "4u7" C0402 15,22.4 r180 bottom
C247 "4u7" C0402 15,23.4 r180 bottom
C248 "10n" C0402 13.2,38.2 r270 bottom
C249 "10n" C0402 11,38.7 r0 bottom
D1 "RB751V-40-TP" SOD323 8.5,8.1 r180 bottom
D2 "Green" LED_0603 8.7,2.1 r90 top
D3 "Orange" LED_0603 27.7,1.9 r270 top
FB1 "220R, 2.5A" C0603 21.4,10 r0 bottom
FB2 "220R, 2.5A" C0603 18.5,29.9 r90 bottom
FB3 "BLM18KG101TN1D" C0603 6.7,36.1 r180 bottom
FB4 "BLM18KG101TN1D" C0603 11,37 r0 bottom
FB5 "BLM15AX601SN1D" C0402 11.1,34.6 r270 bottom
FB6 "BLM18KG101TN1D" C0603 6.9,28.2 r90 bottom
FB7 "BLM18KG101TN1D" C0603 19.9,31.8 r180 top
FB8 "220R, 2.5A" C0603 6,31.2 r270 bottom
FID1 "FID_1MM_SMALL" FID_40X52D 57.5,0.8 r90 top
FID2 "FID_1MM_SMALL" FID_40X52D 64,2.5 r90 bottom
FID3 "FID_1MM_SMALL" FID_40X52D 17,39 r90 top
FID4 "FID_1MM_SMALL" FID_40X52D 1,27 r90 bottom
J1 "QSH-030-01-L-D-A" QSH-030-01-L-D-A 28,35.2 r90 bottom locked
J2 "QSH-030-01-L-D-A" QSH-030-01-L-D-A 28,4.8 r90 bottom locked
L1 "4µ7" IHLP_255MILX270MIL 5,14 r180 top locked
L2 "3u3" IHLP_255MILX270MIL 5,26 r270 top locked
L3 "VLCF4020T-100MR85" VLCF4020 12.3,2.5 r0 top locked
L4 "3u3" IHLP_255MILX270MIL 65,26 r0 top locked
L5 "3u3" IHLP_255MILX270MIL 65,14 r180 top locked
MH1 "MH_5MMC_2.2MMD" MH_5MMD_2.2MMD 67.5,37.5 r0 top locked
MH2 "MH_5MMC_2.2MMD" MH_5MMD_2.2MMD 67.5,2.5 r0 top locked
MH3 "MH_5MMC_2.2MMD" MH_5MMD_2.2MMD 2.5,2.5 r0 top locked
MH4 "MH_5MMC_2.2MMD" MH_5MMD_2.2MMD 2.5,37.5 r0 top locked
Q1 "2N7002BKW,115" SC70_SOT323 8.6,2.3 r0 bottom
Q2 "2N7002BKW,115" SC70_SOT323 29.9,2.8 r270 top
Q3 "SI4816BDY-T1-GE3" 8_SOIC_3.9MM 4.2,7.7 r180 top locked
Q4 "SI4816BDY-T1-GE3" 8_SOIC_3.9MM 4.2,32.3 r0 top locked
Q5 "2N7002BKW,115" SC70_SOT323 2.7,14.6 r0 bottom
Q6 "SI4816BDY-T1-GE3" 8_SOIC_3.9MM 65.8,32.3 r0 top locked
Q7 "SI4816BDY-T1-GE3" 8_SOIC_3.9MM 65.8,7.7 r180 top locked
Q8 "2N7002BKW,115" SC70_SOT323 2.7,11.9 r0 bottom
Q9 "2N7002BKW,115" SC70_SOT323 12.7,2.3 r180 bottom
R1 "22R" R0402 12.4,22.9 r90 top
R2 "200R" R0402 52.6,38 r0 bottom
R3 "200R" R0402 50.4,2 r0 top
R4 "240R" R0402 52.7,16 r180 top
R5 "240R" R0402 50.4,2 r0 bottom
R6 "10k" R0402 38.2,18 r270 top
R7 "10k" R0402 33.5,14.1 r180 bottom
R8 "240R" R0402 52.6,38 r180 top
R9 "240R" R0402 52.7,24 r180 bottom
R10 "240R" R0402 37.9,23.6 r90 top
R11 "240R" R0402 65.2,32.6 r90 bottom
R12 "240R" R0402 65.2,30.4 r90 bottom
R13 "0R" R0402 20.6,11.7 r90 bottom
R14 "0R" R0402 17.8,10.1 r0 bottom
R15 "200R" R0402 15.2,10 r90 bottom
R16 "49R9" R0402 18.9,5.8 r270 top
R17 "49R9" R0402 18.9,3.8 r90 top
R18 "0R" R0402 16.6,22.9 r90 bottom
R19 "0R" R0402 16.8,18.5 r0 bottom
R20 "191R" R0402 18.2,22.7 r180 bottom
R21 "47k" R0402 24.8,31.7 r0 top
R22 "47k" R0402 29.6,33 r0 top
R23 "0R" R0402 24.8,11.9 r90 bottom
R24 "0R" R0402 24.9,35.2 r90 top
R25 "0R" R0402 27.5,35.2 r90 top
R26 "0R" R0402 23.5,35.2 r270 top
R27 "0R" R0402 27.4,10.4 r90 bottom
R28 "4k99" R0402 26.8,38.5 r180 top
R29 "4k99" R0402 26.8,37.3 r180 top
R30 "1k6" R0402 23.6,11.3 r270 bottom
R31 "4k99" R0402 34,2.7 r180 top
R32 "4k99" R0402 33.987,1.408 r180 top
R33 "10k" R0402 35,4.6 r270 top
R34 "0R" R0402 33.4,11.1 r90 bottom
R35 "22R" R0402 18.9,27.1 r90 bottom
R36 "22R" R0402 12.4,27.2 r270 top
R37 "2M2" R0402 15.3,15.3 r90 top
R38 "10k" R0402 29.6,31.7 r0 top
R39 "10k" R0402 29.2,38.5 r0 top
R40 "10k" R0402 29.2,35.2 r90 top
R41 "10k" R0402 10.4,5.6 r0 bottom
R42 "10k" R0402 11.8,7.1 r180 bottom
R43 "10k" R0402 11.8,8.3 r180 bottom
R44 "4k99" R0402 27.2,31.7 r180 top
R45 "4k99" R0402 27.2,32.9 r180 top
R46 "4k99" R0402 35.6,7 r0 top
R47 "4k99" R0402 35.6,8.2 r0 top
R48 "10k" R0402 5.4,9.5 r270 bottom
R49 "10k" R0402 32.075,31.67 r180 top
R50 "22R" R0402 12.4,20.7 r90 top
R51 "0R" R0402 32.075,32.97 r0 top
R52 "22R" R0402 14.2,25 r270 bottom
R53 "10M" R0402 15.3,13.3 r270 top
R54 "10M" R0402 14.7,16.9 r180 top
R55 "4k99" R0402 7.5,13.1 r180 bottom
R56 "4k99" R0402 8.2,9.4 r180 bottom
R57 "10k" R0402 7.5,10.7 r180 bottom
R58 "10k" R0402 12.1,5.2 r270 bottom
R59 "4k99" R0402 61.4,9.7 r270 bottom
R60 "10k" R0402 61.7,2.5 r270 bottom
R61 "1k" R0402 22,11.7 r90 bottom
R62 "10k" R0402 25.8,2.6 r0 top
R63 "10k" R0402 21.1,1.4 r180 top
R64 "10k" R0402 21.1,2.6 r180 top
R65 "0R" R0402 14.1,30 r180 top
R66 "22R" R0402 12.8,25 r270 bottom
R67 "10k" R0402 63.8,10.2 r180 bottom
R68 "10k" R0402 1.4,9.5 r90 bottom
R69 "10k" R0402 2.8,9.5 r90 bottom
R70 "0R" R0402 8,6.8 r180 bottom
R71 "0R" R0402 4.2,9.5 r270 bottom
R72 "22R" R0402 32.712,6.985 r0 top
R73 "100k" R0402 5.3,11.3 r0 bottom
R74 "0R" R0402 30,29.1 r90 bottom
R75 "10k" R0402 14.1,28.8 r180 top
R76 "0R" R0402 28.6,10.4 r270 bottom
R77 "2R2" R0402 14,10 r90 bottom
R78 "0R" R0402 26,10.4 r270 bottom
R79 "10R" R0402 14.3,12.2 r270 bottom
R80 "0R" R0402 18.5,24.9 r270 bottom
R81 "220R" R0402 24.7,38.5 r180 top
R82 "220R" R0402 22,38.5 r0 top
R83 "22R" R0402 7.7,30.3 r180 bottom
R84 "4k99" R0402 17.5,31.6 r0 top
R85 "22R" R0402 9.6,29.2 r90 top
R86 "22R" R0402 11,27.2 r90 top
R87 "4k99" R0402 9.6,27.2 r270 top
R88 "0R" R0402 12.4,25.2 r90 top
R89 "4k99" R0402 11,29.2 r90 top
R90 "22R" R0402 23.4,2.6 r0 top
R91 "10k" R0402 14.1,22.5 r180 top
R92 "22R" R0402 25.8,1.4 r180 top
R93 "0R" R0402 8,5.6 r180 bottom
R94 "10k" R0402 20.025,38.5 r180 top
R95 "10k" R0402 14.1,27.6 r180 top
R96 "10k" R0402 14.1,25.1 r180 top
R97 "10k" R0402 14.1,23.7 r180 top
R98 "10k" R0402 14.1,26.4 r180 top
R99 "1k" R0402 12.4,29.2 r90 top
R100 "10k" R0402 29.2,37.3 r0 top
R101 "1k" R0402 7.4,31.9 r90 bottom
R102 "1k" R0402 24.7,37.3 r0 top
R103 "10k" R0402 7.5,11.9 r180 bottom
R104 "10k" R0402 13.4,5.2 r90 bottom
R105 "0R" R0402 15.5,12.2 r90 bottom
R106 "0R" R0402 10.4,4.2 r180 bottom
R107 "0R" R0402 6,2.2 r90 bottom
R108 "0R" R0402 4.8,24.3 r270 bottom
R109 "10k" R0402 30.4,7.7 r270 top
R110 "10k" R0402 21.3,7.9 r90 top
R111 "100k" R0402 22.3,31.7 r180 top
R112 "22R" R0402 24.675,29.075 r180 bottom
R113 "220R" R0402 8,4.4 r180 bottom
R114 "220R" R0402 32.1,1.9 r90 top
R115 "10k" R0402 32,4.5 r270 top
R116 "0R" R0402 13.2,19.2 r270 bottom
R117 "0R" R0402 12.6,21.2 r0 bottom
R118 "10R" R0402 13.4,22.9 r90 bottom
R119 "14K" R0402 7.25,26 r0 bottom
R120 "4k99" R0402 7.8,24.6 r180 bottom
R121 "1R" R0402 1.4,22.2 r90 bottom
R122 "1R" R0402 1.5,17.9 r90 bottom
R123 "39k" R0402 6.5,16.4 r0 bottom
R124 "200k" R0402 6.2,24.3 r90 bottom
R125 "200k" R0402 4.9,15.5 r90 bottom
R126 "10k5" R0402 6.5,15.1 r0 bottom
R127 "10k" R0402 12.2,22.9 r90 bottom
R128 "0R" R0402 11.5,25 r270 bottom
R129 "10k" R0402 6,4.4 r0 bottom
R130 "10k" R0402 3.4,24.8 r90 bottom
R131 "10k" R0402 5.3,12.7 r0 bottom
R132 "10k" R0402 5.3,13.9 r0 bottom
R133 "10k" R0402 9.9,25 r180 bottom
R134 "12k" R0402 61.7,14.6 r180 bottom
R135 "3k3" R0402 61.7,15.9 r180 bottom
R136 "10k" R0402 5.2,26 r0 bottom
R137 "100k" R0402 24.8,32.9 r0 top
R138 "330k" R0402 8.6,4.8 r270 top
R139 "120k" R0402 8.6,6.8 r270 top
R140 "0R" R0402 56.8,21.7 r90 bottom
R141 "0R" R0402 56.9,19.1 r270 bottom
R142 "10R" R0402 56.4,16.4 r270 bottom
R143 "100k" R0402 22.3,32.9 r0 top
R144 "100k" R0402 26.1,35.2 r270 top
R145 "1R" R0402 68.4,23 r270 bottom
R146 "1R" R0402 68.6,17.8 r270 bottom
R147 "27k" R0402 63.2,24 r180 bottom
R148 "200k" R0402 63.5,15.5 r270 bottom
R149 "200k" R0402 64.9,24.4 r270 bottom
R150 "10k5" R0402 63.2,25.4 r0 bottom
R151 "10k" R0402 58.2,19.1 r270 bottom
R152 "0R" R0402 57.9,16.4 r90 bottom
R153 "10k" R0402 65.3,26.1 r180 bottom
R154 "10k" R0402 66.1,15.5 r270 bottom
R155 "10k" R0402 59.5,16 r180 bottom
R156 "0R" R0402 36.187,1.408 r180 top
R157 "0R" R0402 36.2,2.7 r180 top
R158 "10k" R0402 61.7,13.2 r0 bottom
R159 "22R" R0402 32,28.4 r0 bottom
R160 "22R" R0402 32.712,8.172 r0 top
R161 "22R" R0402 23.4,1.4 r0 top
R162 "1k" R0402 11,25.2 r270 top
R163 "0R" R0402 66.2,24.4 r270 bottom
R164 "0R" R0402 64.9,15.5 r90 bottom
R165 "10k" R0402 14.8,5.2 r90 bottom
TP3 "TP_25MILC" TP_25C 12.8,17.2 r90 bottom
TP5 "TP_25MILC" TP_25C 7,33.9 r90 bottom
TP6 "TP_25MILC" TP_25C 8.4,19.3 r90 top
TP7 "TP_25MILC" TP_25C 9.4,22.9 r90 top
TP8 "TP_25MILC" TP_25C 60.6,22.9 r90 top
TP9 "TP_25MILC" TP_25C 60,17 r90 top
TP10 "TP_25MILC" TP_25C 56.8,22.9 r90 top
TP11 "TP_25MILC" TP_25C 15.2,2.4 r90 top
U1 "MCIMX6Q5EYM10AC" PBGA624 26.5,20 r90 top locked
U2 "MT41J128M16HA-15E:D TR" 96_FPGA_DD3 50,9 r90 top locked
U3 "MT41J128M16HA-15E:D TR" 96_FPGA_DD3 50,9 r270 bottom locked
U4 "MT41J128M16HA-15E:D TR" 96_FPGA_DD3 50,31 r90 top locked
U5 "MT41J128M16HA-15E:D TR" 96_FPGA_DD3 50,31 r270 bottom locked
U6 "TPS3808G09DBVRG4" DBV_SOT_23_6 63.7,7.4 r90 bottom locked
U7 "SN74AHC1G09DBVR" DBV_SOT_23_5 3.3,6.8 r0 bottom
U8 "KSZ9021RN" QFN48_7MMX7MM 12.5,35 r180 top locked
U9 "MIC33050-4YHL TR" MLF_3X3_12PINS 2.5,32.2 r0 bottom locked
U10 "SST25VF016B-75-4I-QAF-ND" WSON8_6X5MM 25.3,6.4 r0 top locked
U11 "ISL6236AIRZ" 32_VFQFN_EXPOSED_PAD 5.3,20 r180 bottom locked
U12 "TPS62175DQCT" DQC_PWSON-N10 10.9,6.4 r270 top locked
U13 "ISL6236AIRZ" 32_VFQFN_EXPOSED_PAD 64.7,20 r0 bottom
Y1 "24MHz" ABM7_V1_1 11.6,13.2 r270 bottom
Y2 "32.768kHz" ABS06 14.2,18.7 r180 top
Y3 "25MHz" ABM7_V1_1 11.75,27.85 r0 bottom

## Footprints (in the part's own frame and the unit in brackets; to place one, negate y for a bottom-side part, rotate by r counter-clockwise, add the part's x,y. Pads: shape width x height; smd on the part's side, far side on the other; paste and mask are expansions set on the pad)
8_SOIC_3.9MM [mm]
  rect 1.2x0.58 smd: 1(-2.8,1.905) 2(-2.8,0.635) 3(-2.8,-0.635) 4(-2.8,-1.905) 5(2.8,-1.905) 6(2.8,-0.635) 7(2.8,0.635) 8(2.8,1.905)
  silkscreen extent -1.91,-2.54 1.91,2.54, body extent -3,-2.45 3,2.45, height 1.75
32_VFQFN_EXPOSED_PAD [mm]
  rect 0.6x0.23 smd mask+0.051: 1(-2.4,1.75) 2(-2.4,1.25) 3(-2.4,0.75) 4(-2.4,0.25) 5(-2.4,-0.25) 6(-2.4,-0.75) 7(-2.4,-1.25) 8(-2.4,-1.75) 17(2.4,-1.75) 18(2.4,-1.25) 19(2.4,-0.75) 20(2.4,-0.25) 21(2.4,0.25) 22(2.4,0.75) 23(2.4,1.25) 24(2.4,1.75)
  rect 0.23x0.6 smd mask+0.051: 9(-1.75,-2.4) 10(-1.25,-2.4) 11(-0.75,-2.4) 12(-0.25,-2.4) 13(0.25,-2.4) 14(0.75,-2.4) 15(1.25,-2.4) 16(1.75,-2.4) 25(1.75,2.4) 26(1.25,2.4) 27(0.75,2.4) 28(0.25,2.4) 29(-0.25,2.4) 30(-0.75,2.4) 31(-1.25,2.4) 32(-1.75,2.4)
  rect 3.3x3.3 smd paste-10 mask+0.051: 33(0,0)
  silkscreen extent -2.7,-2.54 2.54,2.88, body extent -2.54,-2.54 2.54,2.54, height 0.9
96_FPGA_DD3 [mm]
  round 0.35 smd mask+0.05: A1(-3.2,6) A2(-2.4,6) A3(-1.6,6) A7(1.6,6) A8(2.4,6) A9(3.2,6) B1(-3.2,5.2) B2(-2.4,5.2) B3(-1.6,5.2) B7(1.6,5.2) B8(2.4,5.2) B9(3.2,5.2) C1(-3.2,4.4) C2(-2.4,4.4) C3(-1.6,4.4) C7(1.6,4.4) C8(2.4,4.4) C9(3.2,4.4) D1(-3.2,3.6) D2(-2.4,3.6) D3(-1.6,3.6) D7(1.6,3.6) D8(2.4,3.6) D9(3.2,3.6) E1(-3.2,2.8) E2(-2.4,2.8) E3(-1.6,2.8) E7(1.6,2.8) E8(2.4,2.8) E9(3.2,2.8) F1(-3.2,2) F2(-2.4,2) F3(-1.6,2) F7(1.6,2) F8(2.4,2) F9(3.2,2) G1(-3.2,1.2) G2(-2.4,1.2) G3(-1.6,1.2) G7(1.6,1.2) G8(2.4,1.2) G9(3.2,1.2) H1(-3.2,0.4) H2(-2.4,0.4) H3(-1.6,0.4) H7(1.6,0.4) H8(2.4,0.4) H9(3.2,0.4) J1(-3.2,-0.4) J2(-2.4,-0.4) J3(-1.6,-0.4) J7(1.6,-0.4) J8(2.4,-0.4) J9(3.2,-0.4) K1(-3.2,-1.2) K2(-2.4,-1.2) K3(-1.6,-1.2) K7(1.6,-1.2) K8(2.4,-1.2) K9(3.2,-1.2) L1(-3.2,-2) L2(-2.4,-2) L3(-1.6,-2) L7(1.6,-2) L8(2.4,-2) L9(3.2,-2) M1(-3.2,-2.8) M2(-2.4,-2.8) M3(-1.6,-2.8) M7(1.6,-2.8) M8(2.4,-2.8) M9(3.2,-2.8) MECH01(-4,8.4) MECH02(-3.2,8.4) MECH03(-1.6,8.4) MECH04(1.6,8.4) MECH05(3.2,8.4) MECH06(4,8.4) MECH07(-4,6) MECH08(4,6) MECH09(-4,-6) MECH10(4,-6) MECH11(-4,-8.4) MECH12(-3.2,-8.4) MECH13(-1.6,-8.4) MECH14(1.6,-8.4) MECH15(3.2,-8.4) MECH16(4,-8.4) N1(-3.2,-3.6) N2(-2.4,-3.6) N3(-1.6,-3.6) N7(1.6,-3.6) N8(2.4,-3.6) N9(3.2,-3.6) P1(-3.2,-4.4) P2(-2.4,-4.4) P3(-1.6,-4.4) P7(1.6,-4.4) P8(2.4,-4.4) P9(3.2,-4.4) R1(-3.2,-5.2) R2(-2.4,-5.2) R3(-1.6,-5.2) R7(1.6,-5.2) R8(2.4,-5.2) R9(3.2,-5.2) T1(-3.2,-6) T2(-2.4,-6) T3(-1.6,-6) T7(1.6,-6) T8(2.4,-6) T9(3.2,-6)
  silkscreen extent -6.15,-10.5 6.15,10.5, body extent -6.16,-10.54 6.16,10.54, height 1.2
ABM7_V1_1 [mm] "Corrected from 2.2 to 2.4 between pads"
  rect 1.9x2.6 smd: 1(-2.15,0) 2(2.15,0)
  silkscreen extent -3.4,-1.8 3.4,1.8, body extent -3.1,-1.85 3.1,1.85, height 1.45
ABS06 [mm]
  rect 0.75x1.4 smd: 1(-0.725,0) 2(0.725,0)
  silkscreen extent -1.4,-1 1.4,1, body extent -1,-0.62 1,0.6, height 1
C0402 [mm]
  rect 0.5x0.5 smd: 1(-0.5,0) 2(0.5,0)
  silkscreen extent -1,-0.5 1,0.5, body extent -0.5,-0.25 0.5,0.25, height 0.56
C0603 [mm]
  rect 0.8x0.8 smd: 1(-0.75,0) 2(0.75,0)
  silkscreen extent -1.4,-0.7 1.4,0.7, body extent -0.8,-0.42 0.8,0.44, height 0.95
C0805 [mm]
  rect 0.9x1.3 smd: 1(-0.95,0) 2(0.95,0)
  silkscreen extent -1.78,-1.02 1.78,1.02, body extent -1,-0.6 1,0.6, height 1.5
C1206 [mm]
  rect 0.9x1.6 smd: 1(-1.55,0) 2(1.55,0)
  silkscreen extent -2.29,-1.14 2.29,1.14, body extent -1.6,-0.8 1.6,0.8, height 1.8
DBV_SOT_23_5 [mm]
  rect 1x0.55 smd: 1(-1.35,0.95) 2(-1.35,0) 3(-1.35,-0.95) 4(1.35,-0.95) 5(1.35,0.95)
  silkscreen extent -0.9,-1.59 1.02,1.59, body extent -1.5,-1.5 1.5,1.5, height 1.45
DBV_SOT_23_6 [mm]
  rect 1x0.55 smd: 1(-1.35,0.95) 2(-1.35,0) 3(-1.35,-0.95) 4(1.35,-0.95) 5(1.35,0) 6(1.35,0.95)
  silkscreen extent -1.75,-1.59 0.9,1.8, body extent -1.59,-1.59 1.59,1.59, height 1.45
DQC_PWSON-N10 [mm] "Creator MM"
  rect 0.5x0.25 smd mask+0.07: 1(-0.95,1) 2(-0.95,0.5) 3(-0.95,0) 4(-0.95,-0.5) 5(-0.95,-1) 6(0.95,-1) 7(0.95,-0.5) 8(0.95,0) 9(0.95,0.5) 10(0.95,1)
  rect 0.84x2.4 smd mask+0.07: 11(0,0)
  silkscreen extent -1.6,-1.6 1.1,1.8, body extent -1,-1.5 1,1.5, height 0.8
FID_40X52D [mil]
  round 40 smd paste-40 mask+5.91: 1(0,0)
IHLP_255MILX270MIL [mil]
  rect 72x135 smd: 1(-109,0) 2(109,0)
  silkscreen extent -148,-148 148,148, body extent -135,-130 135,130, height 118
LED_0603 [mm]
  rect 0.8x0.8 smd: 1(-0.8,0) 2(0.8,0)
  silkscreen extent -1.78,-0.76 1.52,0.76, body extent -0.85,-0.4 0.85,0.4, height 0.66
MH_5MMD_2.2MMD [mm]
  round 5 / inner round 3.683 / far side round 5 hole 2.2: 1(0,0)
MLF_3X3_12PINS [mm]
  rect 0.48x0.23 smd mask+0.076: 1(-1.36,1.25) 2(-1.36,0.75) 3(-1.36,0.25) 4(-1.36,-0.25) 5(-1.36,-0.75) 6(-1.36,-1.25) 7(1.36,-1.25) 8(1.36,-0.75) 9(1.36,-0.25) 10(1.36,0.25) 11(1.36,0.75) 12(1.36,1.25)
  rect 1.8x1.125 smd mask+0.025: 13(0,0.699)
  rect 0.4x1.19 smd mask+0.076: 14(-0.77,-0.73)
  rect 0.9x1.19 smd mask+0.025: 15(0.45,-0.73)
  silkscreen extent -2,-1.65 1.52,1.9, body extent -1.52,-1.65 1.52,1.65, height 0.9